# Altium PCB DC-UPS-v1.0.PcbDoc (part 1 of 8)
Units mil, origin at the board's own origin, x right, y up, seen from the top; angles counter-clockwise.
Board outline 5905.51 x 3937.01 mil, 4 copper layers (Top Layer, SIG+PWR, SIG+GND, Bottom Layer), stack 62.449 mil thick; 278 components, 138 nets, 716 pads, 780 vias.
Unrouted connection lines stored in the file: 13.
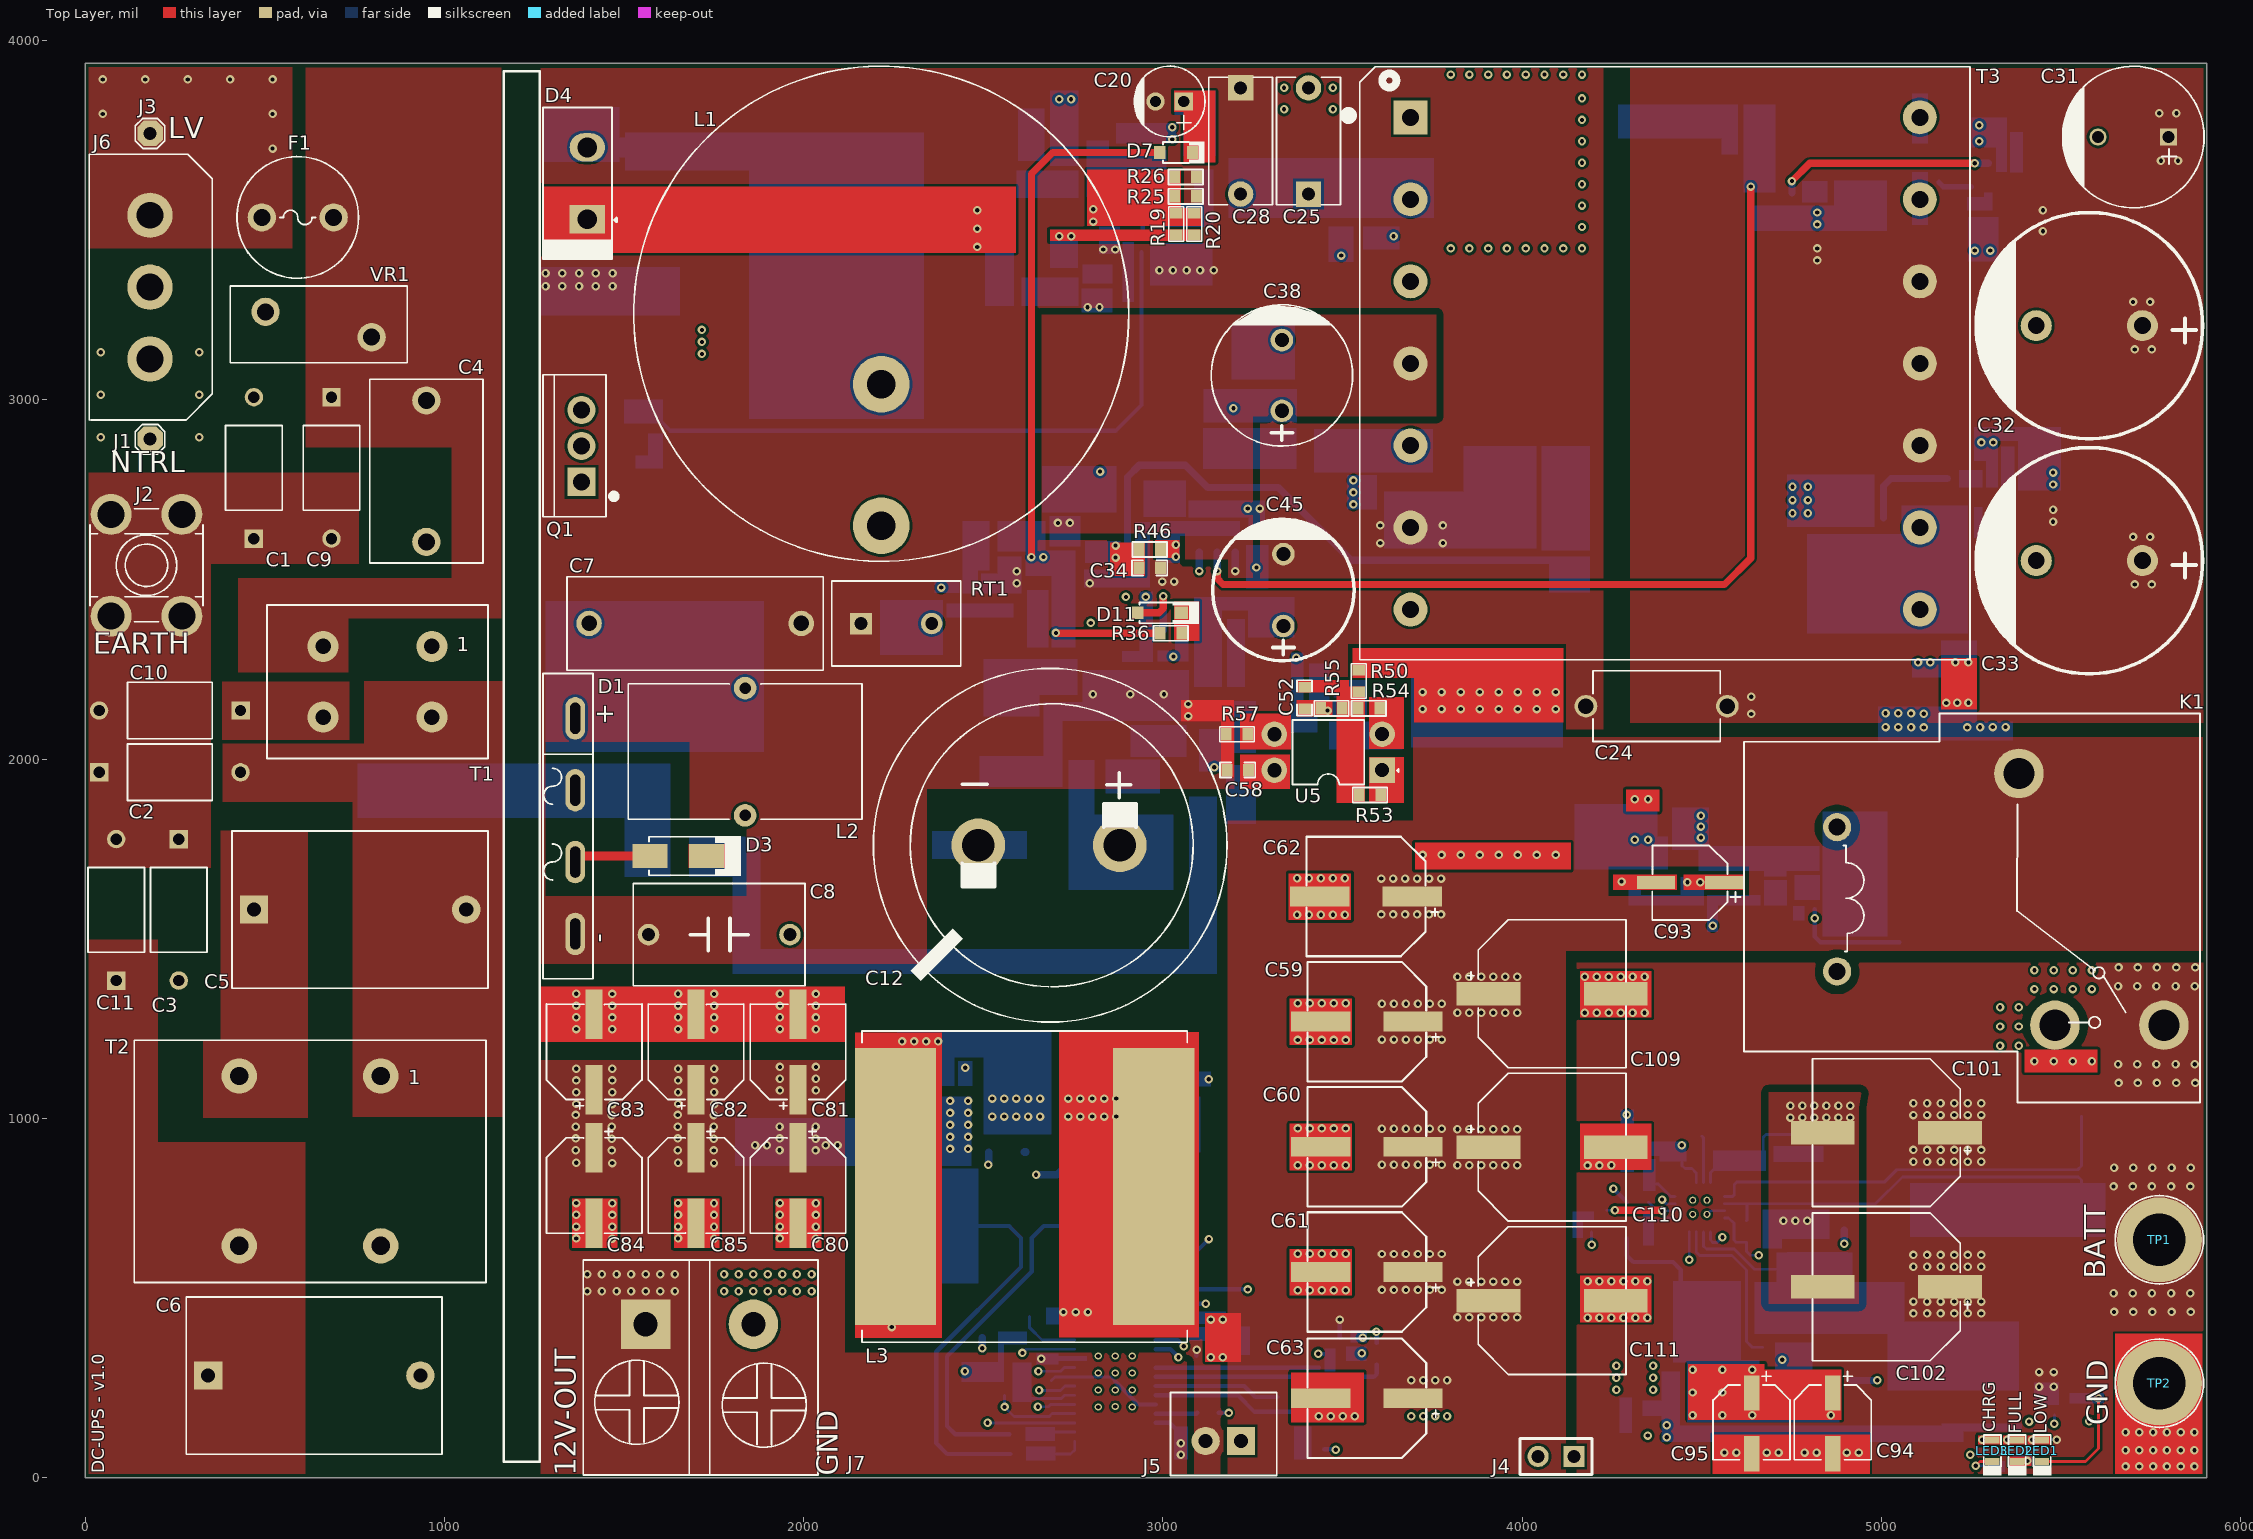
[diagram p0: Top Layer view]
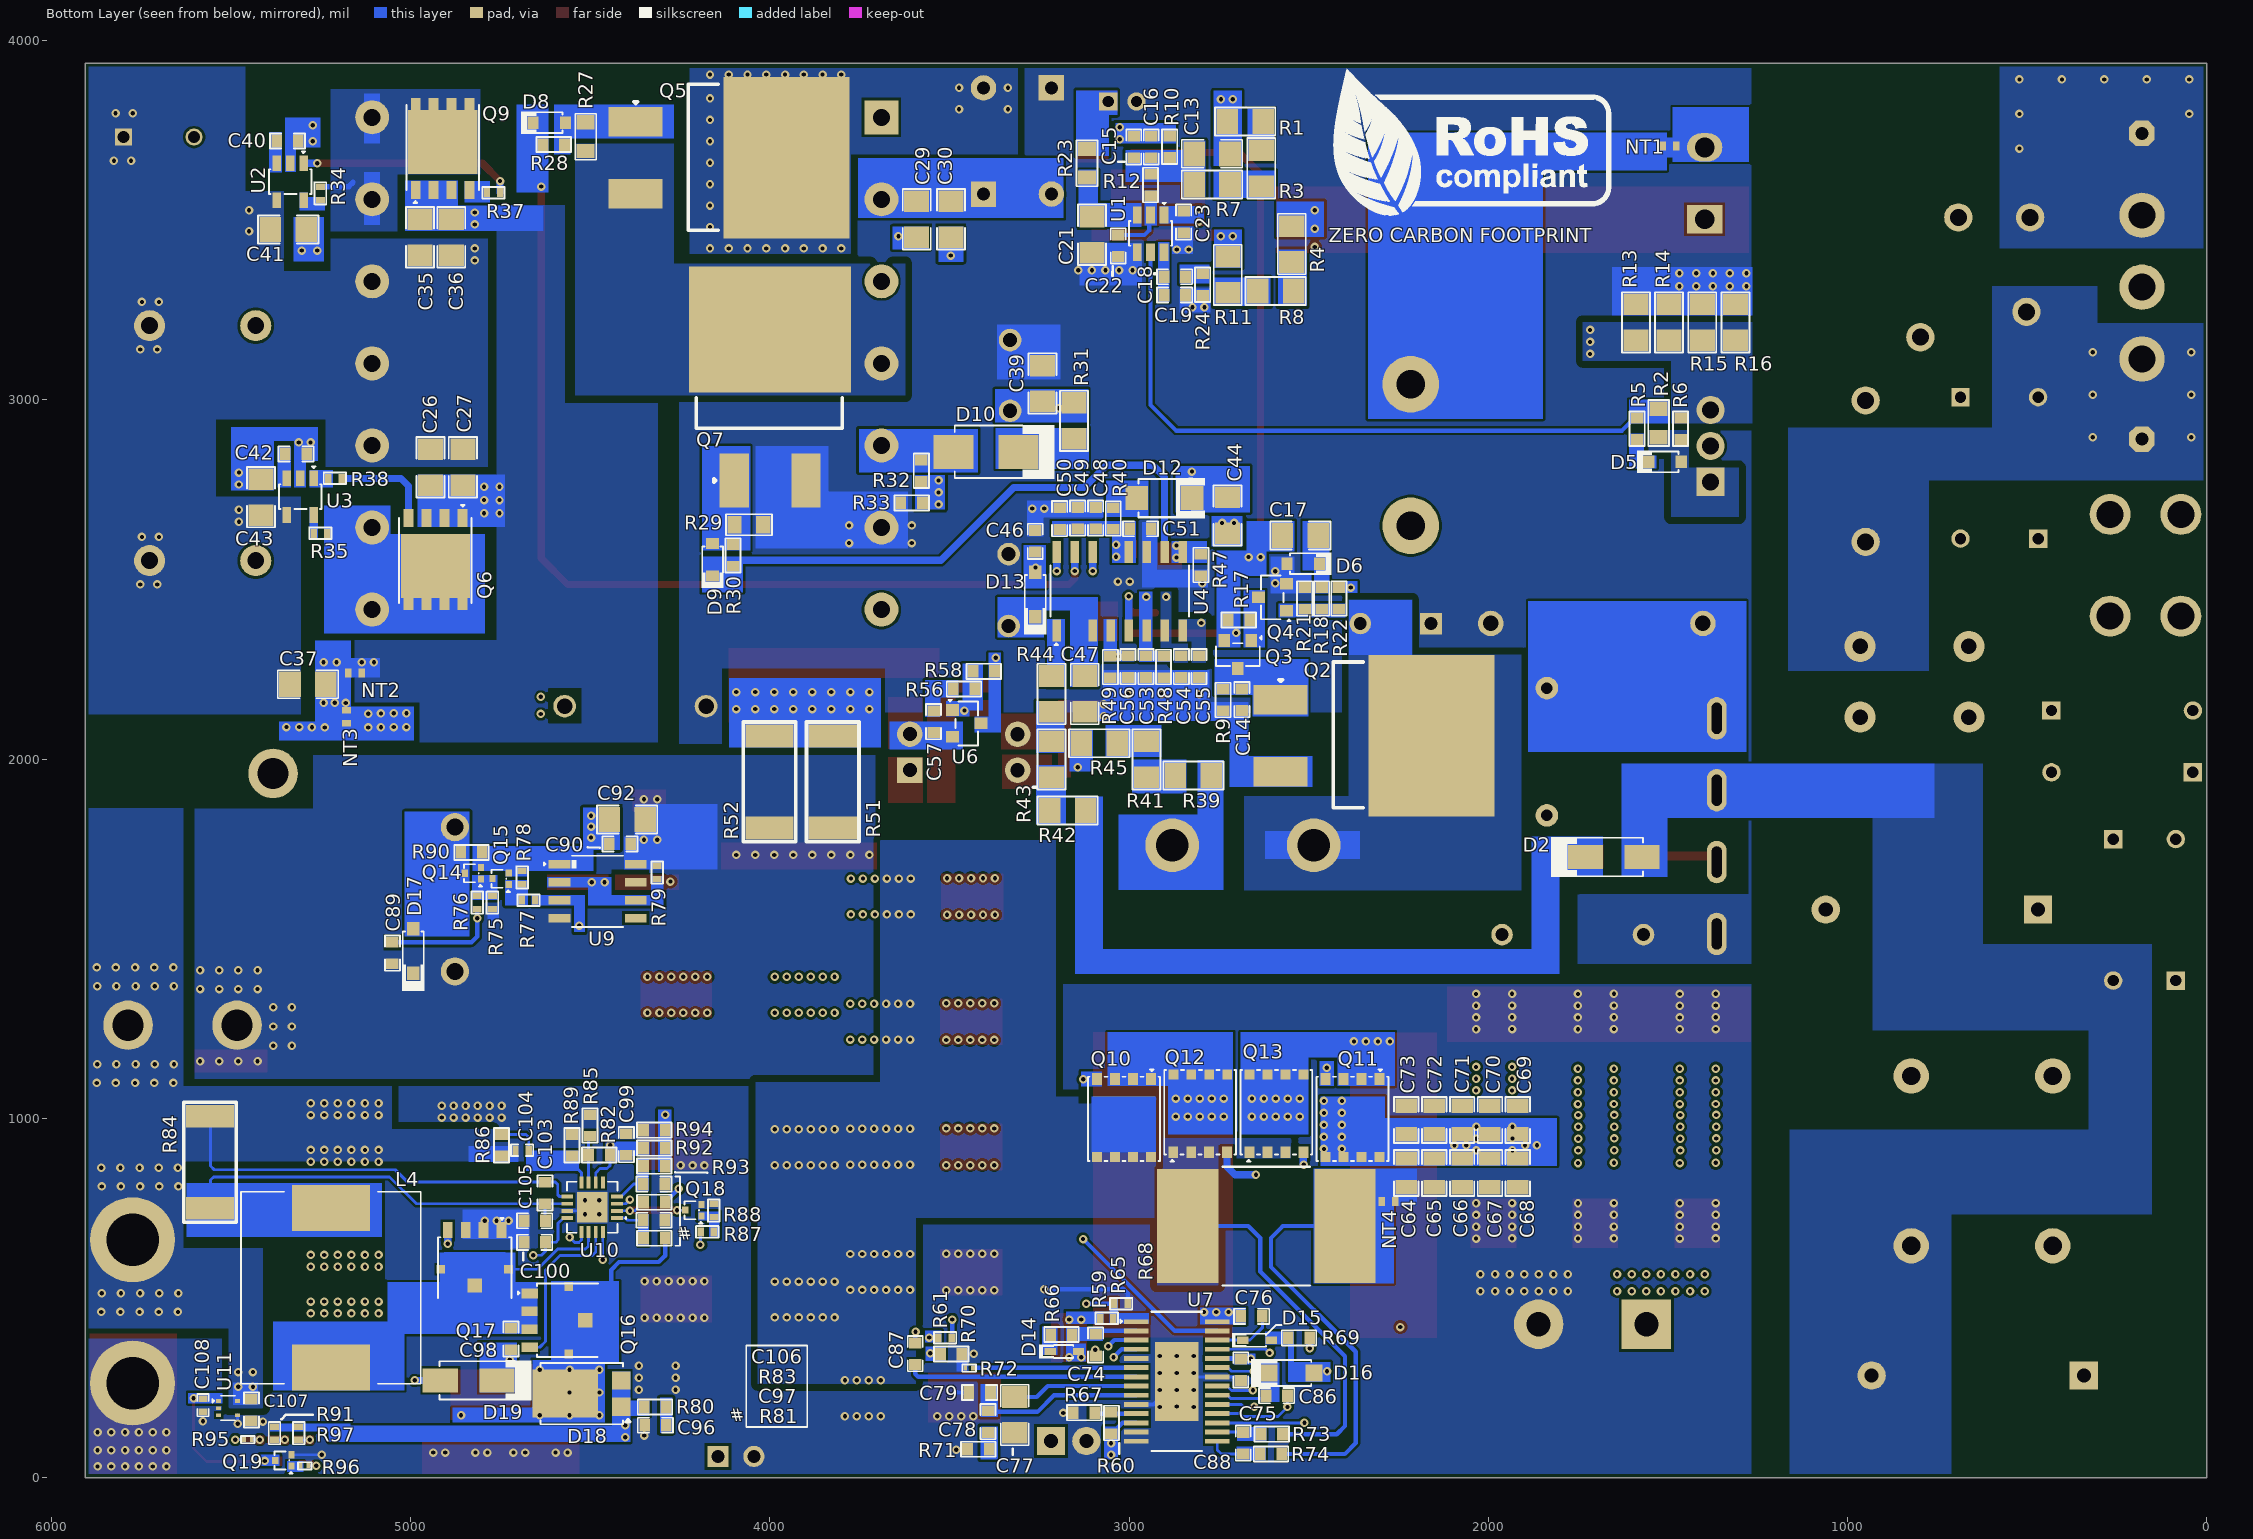
[diagram p1: Bottom Layer view, seen from below]
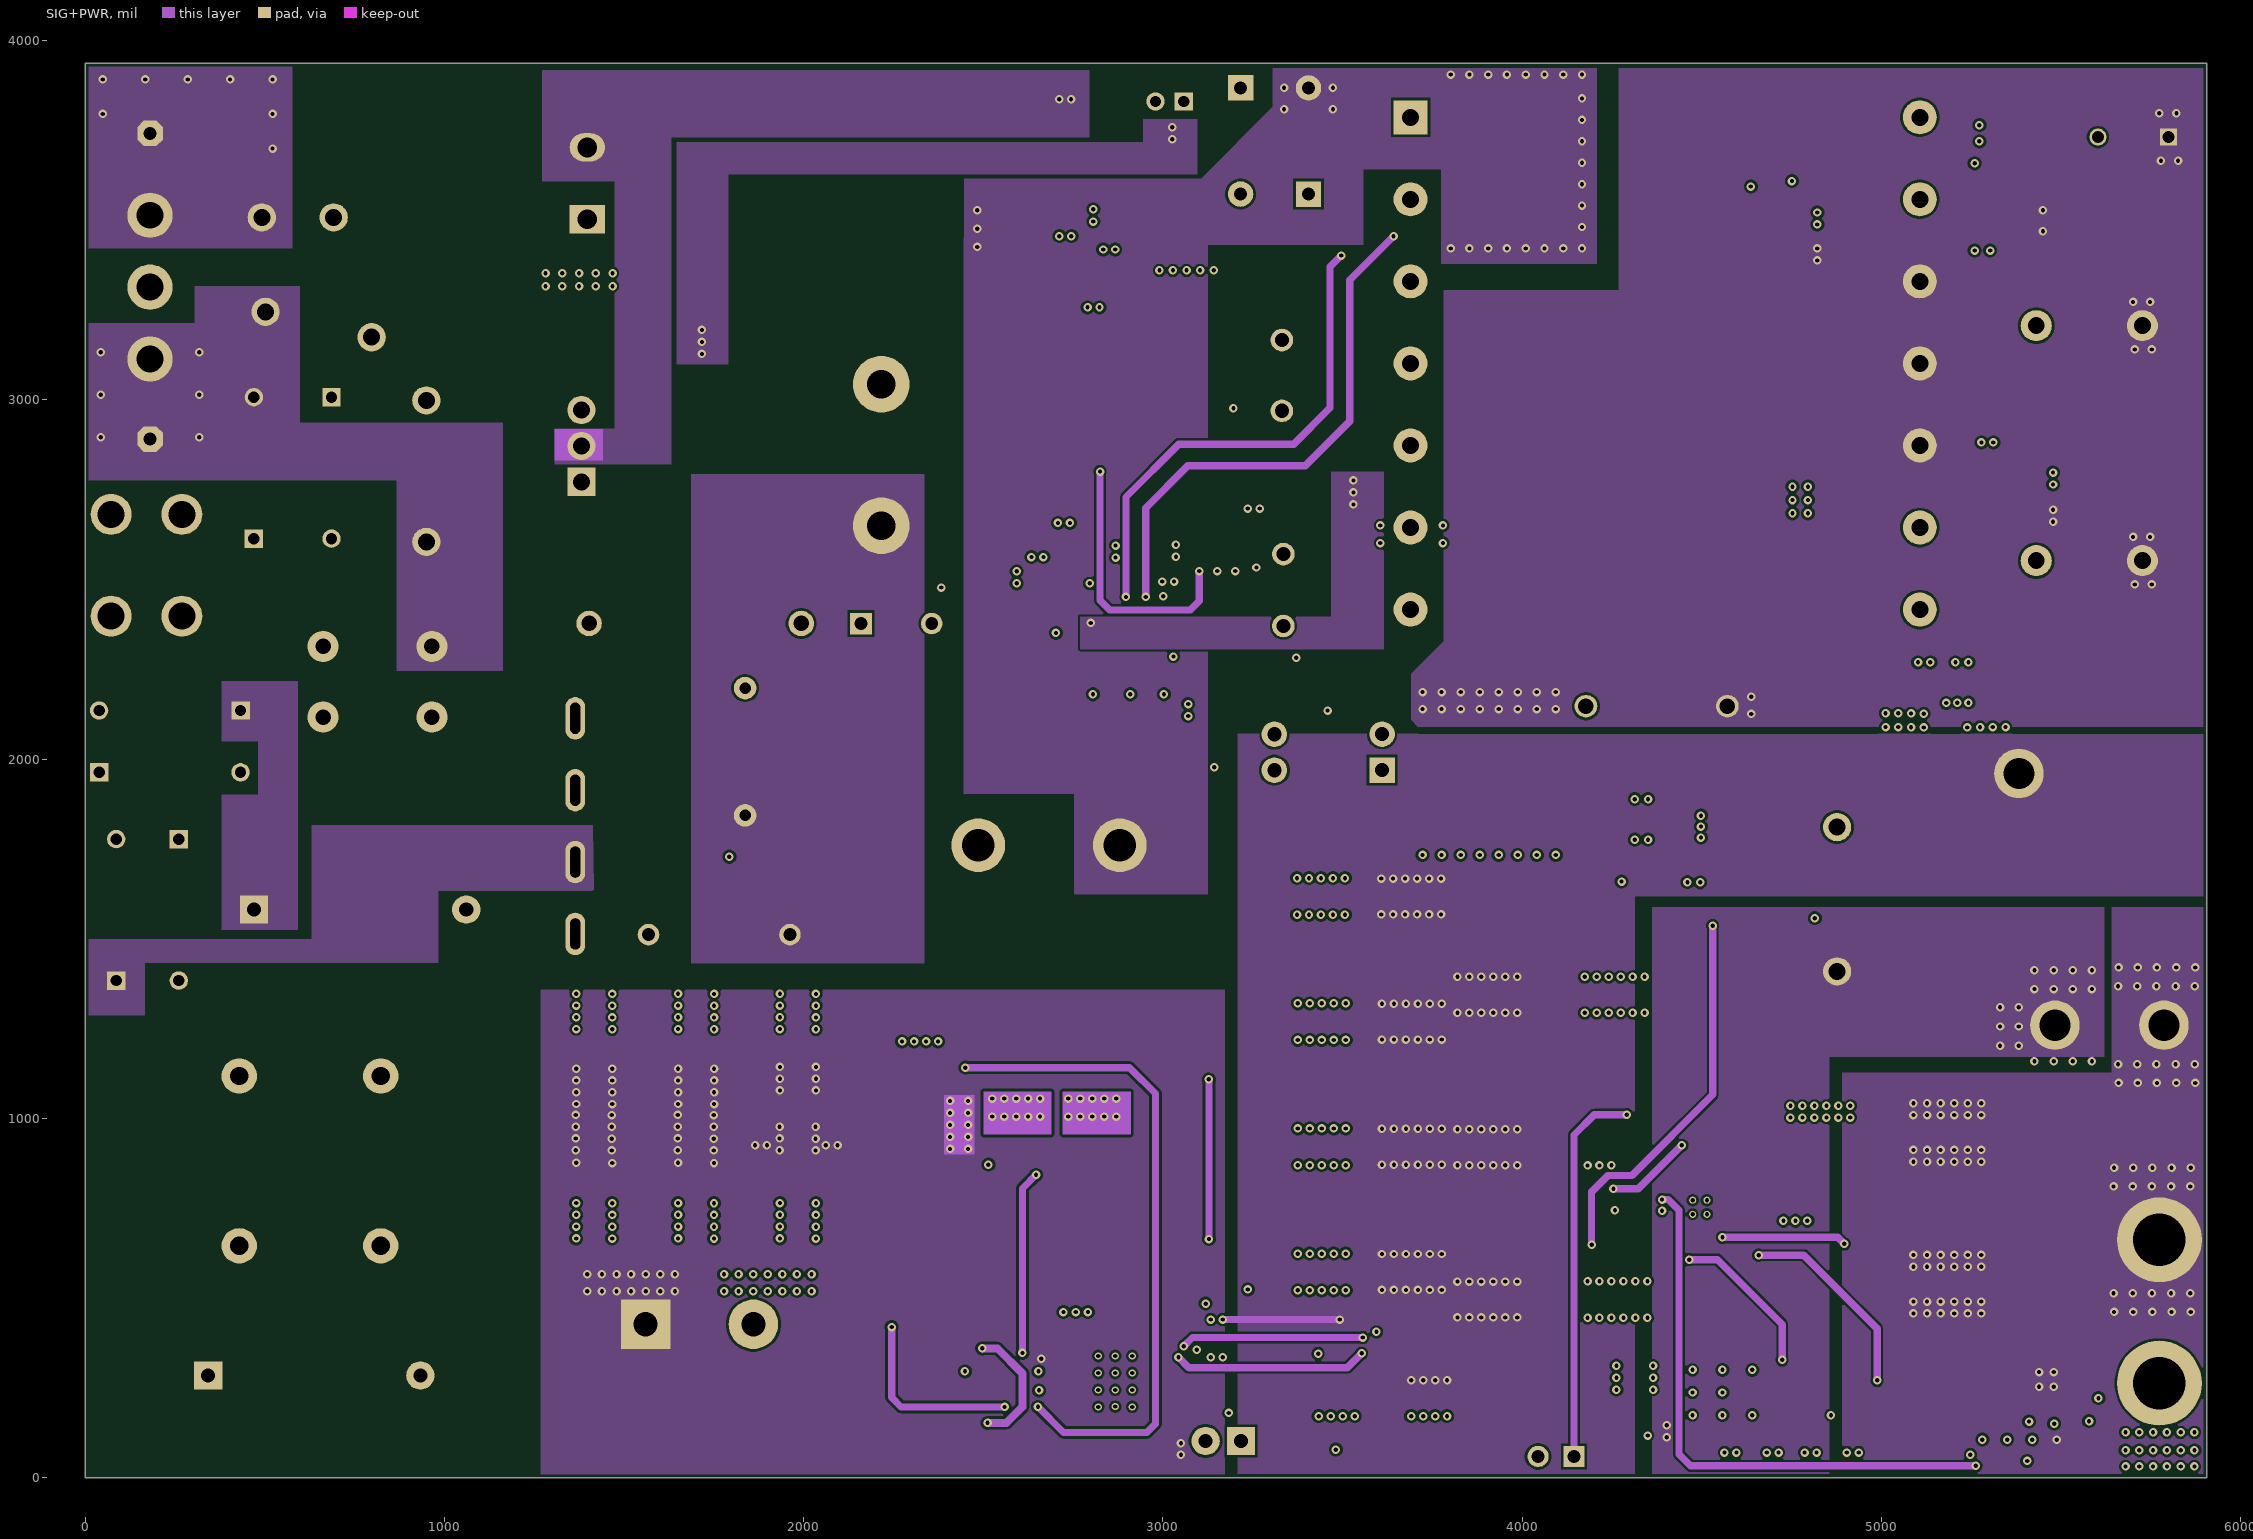
[diagram p2: SIG+PWR]
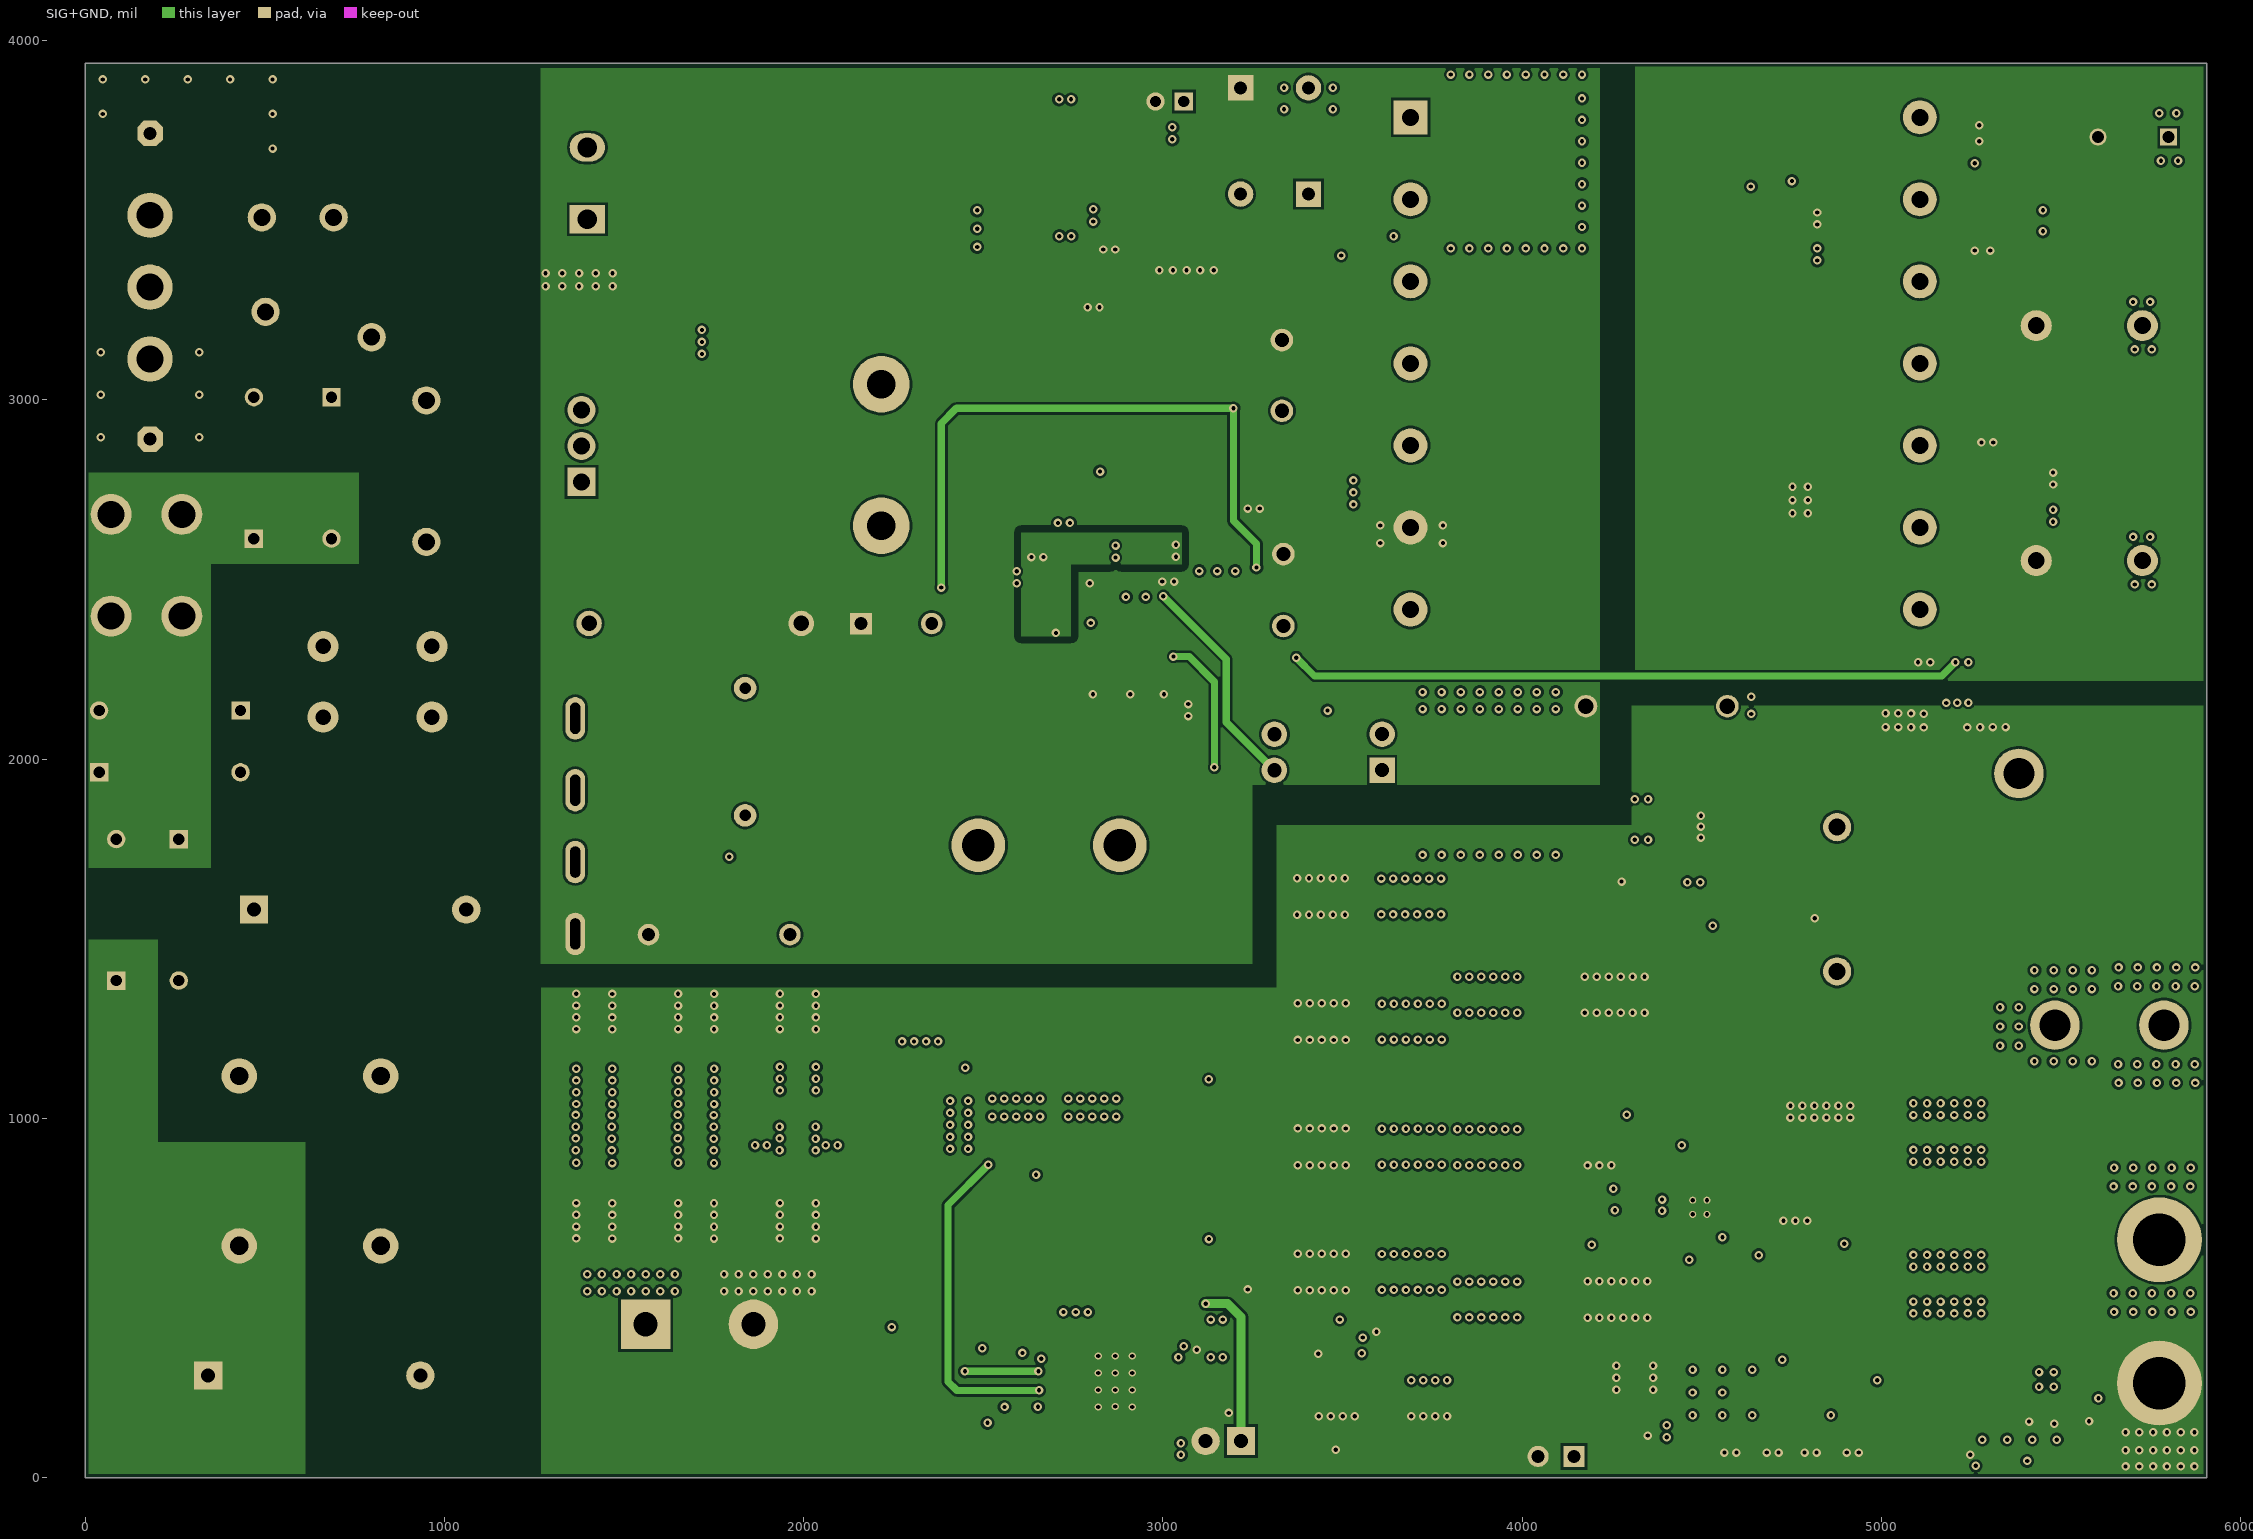
[diagram p3: SIG+GND]
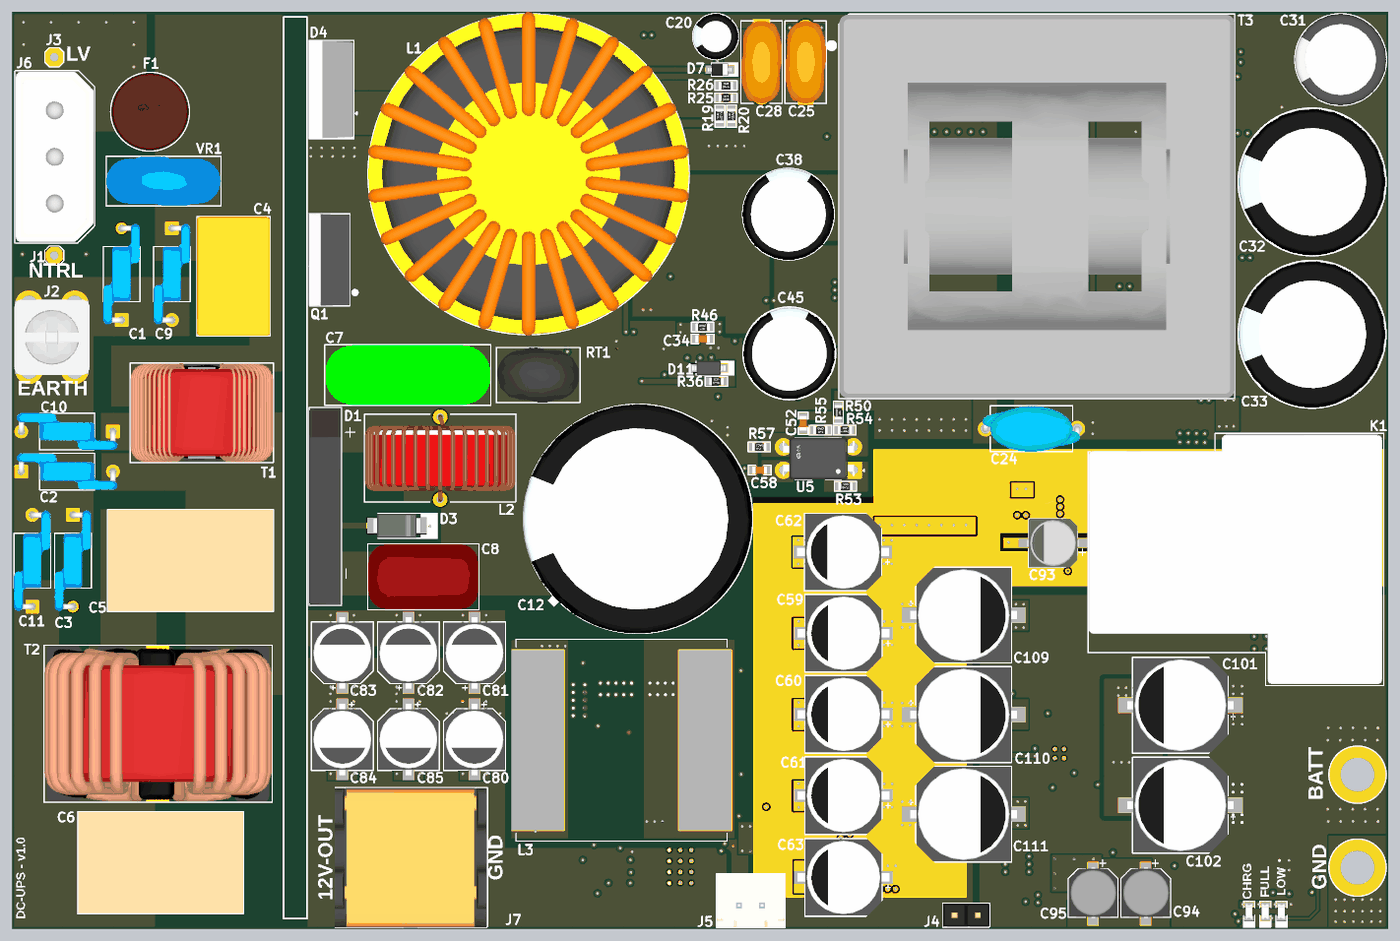
[diagram p6: 3D render of the assembled board from above, using the file's embedded part models]
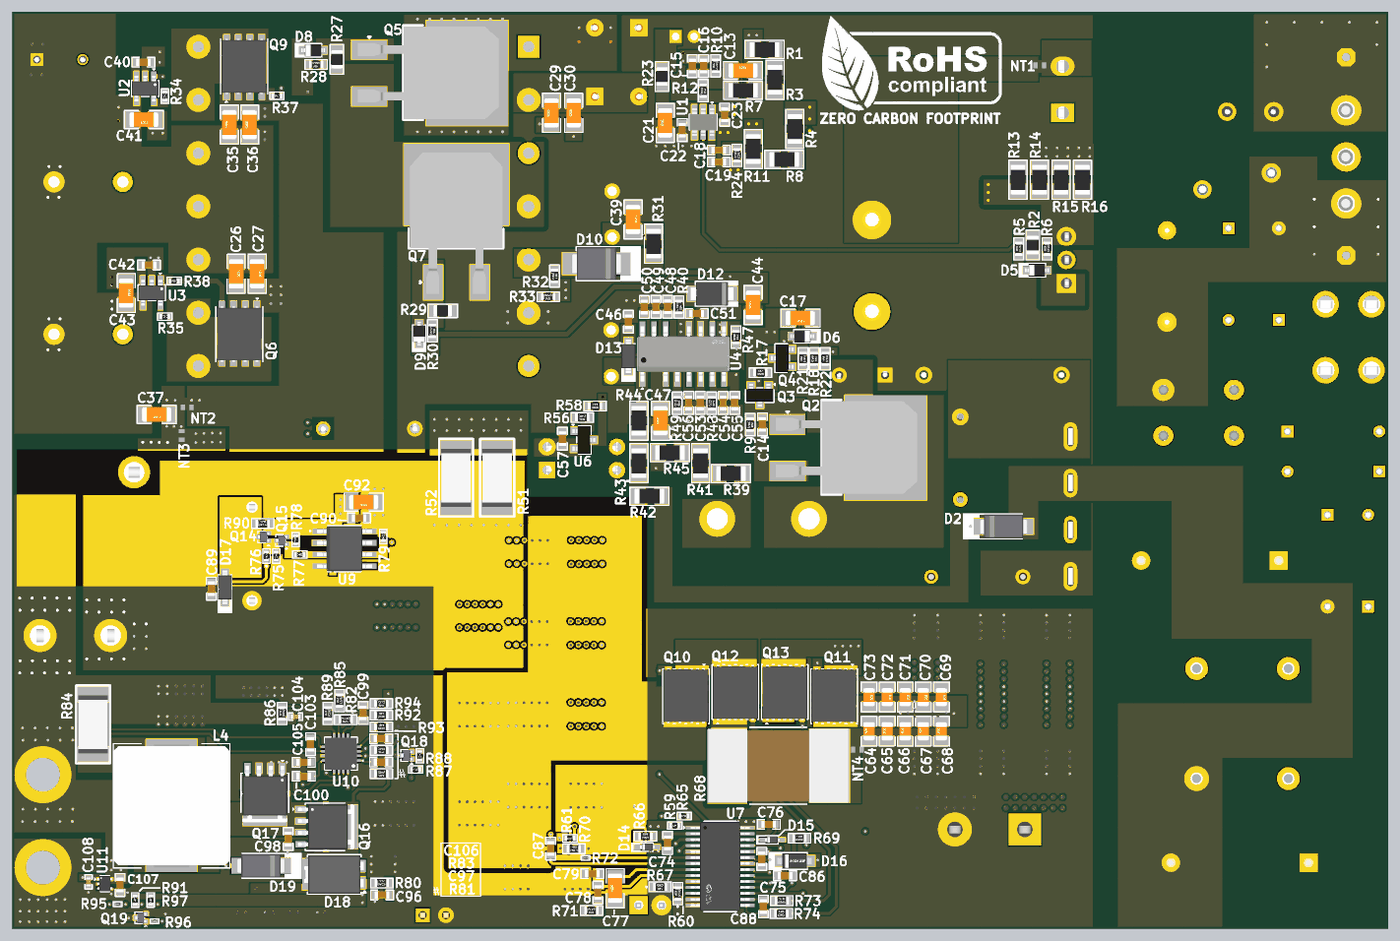
[diagram p7: 3D render of the assembled board from below, using the file's embedded part models]

## Layer stack, top to bottom
Top Solder: solder mask 0.4, Solder Resist, Dk 3.5
Top Layer: signal copper 1.378
Dielectric 2: prepreg 8.284, PP-006, Dk 4.1
SIG+PWR: signal copper 0.598
Dielectric 1: core 41.929, FR-4, Dk 4.8
SIG+GND: signal copper 0.598
Dielectric 3: prepreg 8.284, PP-006, Dk 4.1
Bottom Layer: signal copper 1.378
Bottom Solder: solder mask 0.4, Solder Resist, Dk 3.5

## Board outline
0,0 0,3937.01 5905.51,3937.01 5905.51,0

## Design rules (kind name [scope] priority, off if disabled: settings)
BoardOutlineClearance [All] p1: gap=0 ignorepadtopadclearanceinfootprint=FALSE except(10: Poly-OutlineEdge)
Clearance "DC PWR" [All vs InNet('12V') OR InNet('GND') OR InNet('12V#') OR InNet('SGND') OR InNet('12V-OUT') OR InNet('DC-GND') OR InNet('BUCK-BOOST-IN')] p1: gap=7 ignorepadtopadclearanceinfootprint=FALSE except(0: Arc-Hole Track-Hole SMDPad-Hole THPad-Hole Via-Hole Fill-Hole Poly-Hole Region-Hole Text-Hole; 4: Arc-SMDPad Track-SMDPad SMDPad-SMDPad; 20: Poly-Poly)
Clearance [All] p2: gap=7 ignorepadtopadclearanceinfootprint=FALSE except(0: Arc-Hole Track-Hole SMDPad-Hole THPad-Hole Via-Hole Fill-Hole Poly-Hole Region-Hole Text-Hole; 4: Arc-SMDPad Track-SMDPad SMDPad-SMDPad)
Height [All] p1: minheight=0 maxheight=2000 prefheight=500
HoleSize [All] p1: absolutevalues=TRUE maxlimit=10000 minlimit=1 maxpercent=80.000 minpercent=20.000
HoleToHoleClearance [All] p1: gap=0 allowstackedmicrovias=TRUE
MinimumSolderMaskSliver [All] p1: minsoldermaskwidth=0
PolygonConnect [All] p1: connectstyle=Direct reliefconductorwidth=30 reliefentries=4 polygonreliefangle="90 Angle" airgapwidth=10
RoutingVias [All] p1: holewidth=11.81 width=23.62 viastyle="Through Hole" minholewidth=11.81 minwidth=23.62 maxholewidth=11.81 maxwidth=23.62
SilkToSilkClearance [All] p1: silktosilkclearance=0
SilkToSolderMaskClearance [IsPad] p1: minsilkscreentomaskgap=0 clearancetoexposedcopper=TRUE
SolderMaskExpansion [All] p1: expansion=4 istentingtop=FALSE
UnRoutedNet [All] p1: checkbadconnections=TRUE
Width [All] p1: maxlimit=100 minlimit=8 preferedwidth=8
23 further rules are at their usual default settings.

## Classes and differential pairs
component class Relay-Switch-Sheet: C89 C90 C92 C93 D17 K1 Q14 Q15 R75 R76 R77 R78 R79 R90 U9
component class Power-Sheet-3: C34 C44 C45 C46 C47 C48 C49 C50 C51 C52 C53 C54 C55 C56 C57 C58 D11 D12 D13 R36 R39 R40 R41 R42 R43 R44 R45 R46 R47 R48 R49 R50 R51 R52 R53 R54 R55 R56 R57 R58 U4 U5 U6
component class Power-Sheet-2: C24 C25 C26 C27 C28 C29 C30 C31 C32 C33 C35 C36 C37 C38 C39 C40 C41 C42 C43 D8 D9 D10 NT2 NT3 Q5 Q6 Q7 Q9 R27 R28 R29 R30 R31 R32 R33 R34 R35 R37 R38 T3 U2 U3
component class Power-Sheet-1: C1 C2 C3 C4 C5 C6 C7 C8 C9 C10 C11 C12 C13 C14 C15 C16 C17 C18 C19 C20 C21 C22 C23 D1 D2 D3 D4 D5 D6 D7 F1 J1 J2 J3 J6 L1 L2 NT1 Q1 Q2 Q3 Q4 R1 R2 R3 R4 R5 R6 R7 R8 R9 R10 R11 R12 R13 R14 R15 R16 R17 R18 R19 R20 R21 R22 R23 R24 R25 R26 RT1 T1 T2 U1 VR1
component class Charging-Sheet: C94 C95 C96 C97 C98 C99 C100 C101 C102 C103 C104 C105 C106 C107 C108 D18 D19 J4 L4 LED1 LED2 LED3 Q16 Q17 Q18 Q19 R80 R81 R82 R83 R84 R85 R86 R87 R88 R89 R91 R92 R93 R94 R95 R96 R97 TP1 TP2 U10 U11
component class Buck-Boost-Sheet: C59 C60 C61 C62 C63 C64 C65 C66 C67 C68 C69 C70 C71 C72 C73 C74 C75 C76 C77 C78 C79 C80 C81 C82 C83 C84 C85 C86 C87 C88 C109 C110 C111 D14 D15 D16 J5 J7 L3 NT4 Q10 Q11 Q12 Q13 R59 R60 R61 R65 R66 R67 R68 R69 R70 R71 R72 R73 R74 U7

## Components (designator, comment, footprint, x,y, rotation, side; value= is the part's Value field where it differs from the comment)
C1 "100pF" DE1B3RA101KN4AN01F 470,2810.25 r90 top locked
C2 "220pF" DE1B3RA221KN4AN01F 236.03,1963.01 r0 top locked
C3 "220pF" DE1B3RA221KN4AN01F 261,1580.22 r270 top locked
C4 "220nF" X2P2224KN1B0130150080ES0 950,2801.1 r270 top locked
C5 "0.47UF" R46KI347050M1K 765.76,1581 r0 top locked
C6 "0.47UF" R46KI347050M1K 638,284.25 r0 top locked
C7 "470nF" 450MPK474J 1698,2377.25 r180 top locked
C8 "1uF" MPP105J2W10KN22605 1765,1511.25 r0 top locked
C9 "100pF" DE1B3RA101KN4AN01F 686,2810.25 r270 top locked
C10 "220pF" DE1B3RA221KN4AN01F 236.03,2135.01 r180 top
C11 "220pF" DE1B3RA221KN4AN01F 86.76,1580.22 r90 top locked
C12 "150uF" KN151M45025*30A 2683,1760 r180 top locked
C13 "10pF" Cap-1206 2769,3684.25 r180 bottom locked
C14 "100nF" Cap-0603 2686,2165.25 r90 bottom locked
C15 "3.9nF" Cap-0603 2987,3703.25 r270 bottom locked
C16 "560pF" Cap-0603 2938,3703.25 r270 bottom locked
C17 "470nF" Cap-1206 2523,2621.75 r0 bottom locked
C18 "0.22uF" Cap-0603 2873,3342.25 r0 bottom locked
C19 "0.1uF" Cap-0603 2873,3291.25 r0 bottom locked
C20 "10uF" ERM1HM100D11OT 3018.63,3830 r180 top locked
C21 "0.47uF" Cap-1206 3103,3459.25 r90 bottom locked
C22 "10pF" Cap-0603 3030,3428.25 r90 bottom locked
C23 "1000pF" Cap-0603 2848,3494.25 r90 bottom locked
C24 "2.2nF" DE1E3RA222MA4BN01F 4374,2147 r0 top locked
C25 "22nF" KP223J2J0701 3405,3720 r90 top locked
C26 "4.7uF" Cap-1206 4944,2812 r270 bottom locked
C27 "4.7uF" Cap-1206 4854,2812 r270 bottom locked
C28 "22nF" KP223J2J0701 3216,3720 r270 top locked
C29 "150pF" Cap-1206 3591,3502.25 r90 bottom locked
C30 "100pF" Cap-1206 3495.76,3502.25 r90 bottom
C31 "680uF" EEU-FR1V681B 5700.57,3731 r180 top locked
C32 "2200uF" ERF1VM222L25OT 5578,3206 r180 top locked
C33 "2200uF" ERF1VM222L25OT 5578,2552 r180 top locked
C34 "47nF" Cap-0603 2963,2532 r180 top locked
C35 "4.7uF" Cap-1206 4973.25,3452 r90 bottom locked
C36 "4.7uF" Cap-1206 4886.13,3452 r90 bottom locked
C37 "0.1uF" Cap-1206 5285,2208 r0 bottom locked value=100nF
C38 "470uF" EEUFR1V471B 3331,3067.58 r90 top locked
C39 "2.2uF" Cap-1206 3241,3045 r270 bottom locked
C40 "2.2uF" Cap-0603 5342,3720 r0 bottom locked
C41 "0.1uF" Cap-1206 5339.71,3473.36 r0 bottom locked value=100nF
C42 "2.2uF" Cap-0603 5318,2849.25 r0 bottom locked
C43 "0.1uF" Cap-1206 5416,2729 r270 bottom locked value=100nF
C44 "2.2uF" Cap-1206 2726,2678 r90 bottom locked
C45 "1000uF" ERR1VM102G20OT 3335,2470.25 r90 top locked
C46 "2.2uF" Cap-0603 3261,2606 r90 bottom locked
C47 "1uF" Cap-1206 3123,2181 r90 bottom locked
C48 "4.7uF" Cap-0603 3093,2670.18 r270 bottom locked
C49 "4.7uF" Cap-0603 3143,2670.18 r270 bottom locked
C50 "4.7uF" Cap-0603 3193,2669 r270 bottom locked
C51 "10nF" Cap-0603 2968,2641 r0 bottom locked
C52 "100pF" Cap-0603 3394,2170 r90 top locked
C53 "220pF" Cap-0603 2953.2,2257.25 r90 bottom locked
C54 "10nF" Cap-0603 2854.4,2257.25 r90 bottom locked
C55 "47pF" Cap-0603 2805,2257.25 r90 bottom locked
C56 "4.7nF" Cap-0603 3002.6,2257.25 r90 bottom locked
C57 "47nF" Cap-0603 3544,2104 r90 bottom locked
C58 "DNP" Cap-0603 3208,1969.2 r0 top locked
C59 "18uF" 50SVPF18M 3567.27,1269.11 r180 top locked
C60 "18uF" 50SVPF18M 3567.27,920.77 r180 top locked
C61 "18uF" 50SVPF18M 3567.27,572.44 r180 top locked
C62 "18uF" 50SVPF18M 3565.02,1617.44 r180 top locked
C63 "18uF" 50SVPF18M 3567.27,221 r180 top locked
C64 "4.7uf" Cap-0805 2228.22,848.25 r90 bottom locked
C65 "4.7uf" Cap-0805 2150.67,848.25 r90 bottom locked
C66 "4.7uf" Cap-0805 2073.11,848.25 r90 bottom locked
C67 "4.7uf" Cap-0805 1995.56,848.25 r90 bottom locked
C68 "4.7uf" Cap-0805 1918,848.25 r90 bottom locked
C69 "4.7uf" Cap-0805 1918,995.25 r270 bottom locked
C70 "4.7uf" Cap-0805 1995.56,995.25 r270 bottom locked
C71 "4.7uf" Cap-0805 2073.11,995.25 r270 bottom locked
C72 "4.7uf" Cap-0805 2150.67,995.25 r270 bottom locked
C73 "4.7uf" Cap-0805 2228.22,995.25 r270 bottom locked
C74 "0.1uF" CAP-0603 3093,369.25 r90 bottom locked
C75 "0.1uF" CAP-0603 2689,300.25 r90 bottom locked
C76 "0.1uF" CAP-0603 2659,449 r180 bottom locked
C77 "680nF" Cap-1206 3318,174.42 r90 bottom locked
C78 "68nF" Cap-0603 3392.22,156 r90 bottom locked
C79 "2.2nF" Cap-0603 3415.75,237 r180 bottom locked
C80 "270uF" 16SVPG270M 1984,812.88 r270 top locked
C81 "270uF" 16SVPG270M 1984.02,1185.12 r90 top locked
C82 "270uF" 16SVPG270M 1700.52,1185.12 r90 top locked
C83 "270uF" 16SVPG270M 1417.02,1185.12 r90 top locked
C84 "270uF" 16SVPG270M 1417,812.88 r270 top locked
C85 "270uF" 16SVPG270M 1700.5,812.88 r270 top locked
C86 "0.1uF" CAP-0603 2589,228.25 r0 bottom locked
C87 "330pF" Cap-0603 3594.83,345 r270 bottom locked
C88 "47pF" Cap-0603 2682,96 r270 bottom locked
C89 "0.1uF" CAP-0603 5050,1460 r270 bottom locked
C90 "0.1uF" CAP-0603 4416.7,1764 r180 bottom locked
C92 "4.7uF" Cap-1206 4396.7,1831.91 r0 bottom locked
C93 "33uF" RVT1E330M0505 4466.52,1656 r180 top
C94 "15uF" UUD1V150MCL1GS 4864,151 r270 top
C95 "15uF" UUD1V150MCL1GS 4638,151 r270 top locked
C96 "2.2uF" Cap-0603 4318,145.75 r0 bottom locked
C97 "1uF" Cap-0603 4322,716.42 r0 bottom locked
C98 "0.1uF" CAP-0603 4720.49,386 r270 bottom locked
C99 "1uF" Cap-0603 4399,927 r270 bottom locked
C100 "1uF" Cap-0603 4654,655 r180 bottom locked
C101 "68uF" 50SVPF68M 5013,960 r180 top
C102 "68uF" 50SVPF68M 5013,531 r180 top
C103 "0.1uF" CAP-0603 4625.34,792.34 r270 bottom locked
C104 "22PF" Cap-0402 4689,911 r0 bottom locked value=22pF
C105 "0.1uF" CAP-0603 4654,715 r0 bottom locked
C106 "0.1uF" CAP-0603 4322,816.75 r180 bottom locked
C107 "1uF" Cap-0603 5442.31,188.69 r90 bottom locked
C108 "100pF" Cap-0402 5577.31,201.69 r90 bottom locked
C109 "68uF" 50SVPF68M 4083,1346.77 r0 top
C110 "68uF" 50SVPF68M 4083,919.77 r0 top locked
C111 "68uF" 50SVPF68M 4083,492.77 r0 top
D1 "GBU806" GBU 1364.35,1813.25 r270 top locked
D2 "MURA160T3G" SMA 1651,1727.25 r180 bottom locked
D3 "MURA160T3G" SMA 1651,1730.25 r180 top locked
D4 "STTH8L06FP" TO-220-2 1398,3602.25 r90 top locked
D5 "MMDL914-TP" SOD-323 1508,2827 r180 bottom locked
D6 "MMDL914-TP" SOD-323 2515,2543.75 r0 bottom locked
D7 "1N4148WS-7-F" SOD-323 3036.72,3688 r180 top locked
D8 "MMDL914-TP" SOD-323 4613.69,3771 r180 bottom locked
D9 "MMDL914-TP" SOD-323 4159,2554.72 r90 bottom locked
D10 "STPS160UY" SMB_ 3398,2855 r180 bottom locked
D11 "MMSZ5234B-7-F" SOD-123 2988.99,2407 r0 top locked
D12 "ES1JF" DO-214AD 2901.84,2726 r0 bottom locked
D13 "1N4148W-7-F" SOD-123 3261,2458 r270 bottom locked value=2pF
D14 "CDBUR0230L-HF" SOD-523F 3180,351.25 r0 bottom locked
D15 "CDBUR0230L-HF" SOD-523F 2643.99,382.25 r0 bottom locked
D16 "B0520W" SOD-123F 2548.01,291.25 r0 bottom locked
D17 "1N4148W-7-F" SOD-123 4992,1466 r270 bottom locked value=2pF
D18 "ST2045" TO-277 4491.24,233.75 r90 bottom locked
D19 "SS24A" SMA 4837.74,270.79 r0 bottom locked
F1 "37215000001" 37215000001 592,3507.25 r0 top locked
J1 "Test Point -TH 1.8mm Hole size 0.92mm" "Test Point -TH 1.8mm Hole size 0.92mm" 181,2890.25 r180 top locked
J2 "T44001" T44001 171,2539.25 r180 top locked
J3 "Test Point -TH 1.8mm Hole size 0.92mm" "Test Point -TH 1.8mm Hole size 0.92mm" 181,3741.25 r180 top locked
J4 "X6511WV-02H-C60D30" HDR1X2_ 4144,59 r180 top locked
J5 "B2B-XH-A(LF)(SN)" B2B-XH-A(LF)(SN)_ 3168,102 r180 top locked
J6 "X5050WV-03-N2SN" X5050WV-03-N2SN 181,3513.25 r270 top locked
J7 "DBT50G-7.62-2P-BK-P" DBT50G-7.62-2P-BK-P 1710,427 r0 top locked
K1 "NB90-12S-S-C" NB90-12S-S-C 5330.81,1609.61 r270 top locked
L1 "85uH" FC-PFC1060-850M-B-L 2216,2846.15 r270 top locked
L2 "100uH" 7447021 1837,2020.25 r0 top locked
L3 "1uH" FXL2213-1R0-M 2615,810 r180 top locked
L4 "1.5uH" FAUL1350-1R5MT 5221,528.54 r90 bottom locked
LED1 "RED" LED-0603 5446.64,74.75 r270 top locked
LED2 "Emerald" LED-0603 5377.32,74.75 r270 top locked
LED3 "NCD0603O2" LED-0603 5308,74.75 r270 top locked
NT1 "Net Tie_SMD" "Net Tie Pad"#1 1496,3706 r180 bottom locked net-tie
NT2 "Net Tie_SMD" "Net Tie Pad"#1 5154.5,2239 r0 bottom net-tie
NT3 "Net Tie_SMD" "Net Tie Pad"#2 5178,2117.5 r90 bottom locked net-tie
NT4 "Net Tie_SMD" "Net Tie Pad"#1 2278,769 r180 bottom locked net-tie
Q1 "IPP60R099P7XKSA1" TO-220-3 1381.57,2871.25 r90 top locked
Q2 "STB24NM60N-VB" TO-263 2367.96,2065 r270 bottom locked
Q3 "SI2309CDS-T1-E3" SOT-23 2697.25,2291 r0 bottom locked
Q4 "MMBT4401-7-F" SOT-23 2600.88,2450 r90 bottom locked
Q5 "SIHB24N80AE-GE3" TO-263 4163,3673 r270 bottom locked
Q6 "CSD19502Q5B" VSON-CLIP-8(6x5) 4930.1,2552.73 r270 bottom locked
Q7 "SIHB24N80AE-GE3" TO-263 3999,2985.04 r180 bottom locked
Q9 "CSD19502Q5B" VSON-CLIP-8(6x5) 4910.1,3701.73 r90 bottom locked
Q10 "CSD18511Q5A" "8-VSONP (5x6)" 3014,1001.11 r270 bottom locked
Q11 "CSD19533Q5A" "8-VSONP (5x6)" 2378,1001.11 r270 bottom locked
Q12 "CSD18531Q5A" "8-VSONP (5x6)" 2801.81,1014.28 r90 bottom locked
Q13 "CSD19533Q5A" "8-VSONP (5x6)" 2589.81,1014.28 r90 bottom locked
Q14 "MMBT3904M" SOT-723 4826,1682 r90 bottom locked
Q15 "MMBT3904M" SOT-723 4749,1666.91 r90 bottom locked
Q16 "SIR426DP-T1-GE3" PowerPAK-SO-8 4590.73,438 r180 bottom locked
Q17 "SIR426DP-T1-GE3" PowerPAK-SO-8 4821,612 r270 bottom locked
Q18 "MMBT3904M" SOT-723 4212.36,744.33 r90 bottom locked
Q19 "MMBT3904M" SOT-723 5353.36,48 r90 bottom locked
R1 "3.09MR" Res-1206 2677,3774.25 r0 bottom locked
R2 "10R" RES-0805 1526,2935 r270 bottom locked
R3 "3.3MR" Res-1206 2632,3644.25 r90 bottom locked
R4 "3.09MR" Res-1206 2547,3433.25 r90 bottom locked
R5 "1R" Res-0603 1586,2919 r270 bottom locked
R6 "82.5K" Res-0603 1465,2919 r270 bottom locked
R7 "3.3MR" Res-1206 2769,3599.25 r180 bottom locked
R8 "3.3MR" Res-1206 2592,3302.25 r180 bottom locked
R9 "1M" Res-0603 2738,2164.25 r90 bottom locked
R10 "24.3K" Res-0603 2887,3704.25 r270 bottom locked
R11 "3.3MR" Res-1206 2725,3347.25 r270 bottom locked
R12 "3K" Res-0603 2940,3597.25 r90 bottom locked value=3kR
R13 "0.1R" Res-1206 1589.33,3215.25 r270 bottom locked value=100mR
R14 "0.1R" Res-1206 1497,3215.25 r270 bottom locked value=100mR
R15 "0.1R" Res-1206 1404.67,3215.25 r270 bottom locked value=100mR
R16 "0.1R" Res-1206 1312.33,3215.25 r270 bottom locked value=100mR
R17 "100K" Res-0603 2694.25,2387 r0 bottom locked value=100kR
R18 "75K" Res-0603 2464,2447 r90 bottom locked value=75kR
R19 "36.5K" Res-0603 3037,3488.75 r270 top locked
R20 "120K" RES-0603 3087,3488.75 r270 top locked
R21 "49K9" Res-0603 2511.25,2447 r270 bottom locked
R22 "390K" Res-0603 2416,2447 r270 bottom locked value=390kR
R23 "10R" RES-0805 3117,3658.25 r90 bottom locked
R24 "274K" Res-0603 2795,3320.25 r90 bottom locked
R25 "75K" Res-0603 3063,3566 r180 top locked value=75kR
R26 "390K" Res-0603 3063,3620 r180 top locked value=390kR
R27 "10K" RES-0805 4512,3732 r90 bottom locked
R28 "10R" Res-0603 4601,3710 r180 bottom locked
R29 "10K" RES-0805 4058,2652 r0 bottom locked
R30 "10R" Res-0603 4102,2566.69 r90 bottom locked
R31 "0R" Res-1206 3153,2941 r270 bottom locked value=0mR
R32 "36.5K" Res-0603 3578,2802 r90 bottom locked value=36.5kR
R33 "8.45K" Res-0603 3605,2713 r180 bottom locked value=8.45kR
R34 "0R" Res-0402 5250,3574.14 r270 bottom locked
R35 "0R" Res-0402 5250.34,2628 r0 bottom locked
R36 "10K" Res-0603 3021.98,2350 r180 top locked
R37 "0R" Res-0402 4769,3576 r180 bottom locked
R38 "0R" Res-0402 5210,2781 r0 bottom locked
R39 "4.99MR" Res-1206 2821,1954 r180 bottom locked
R40 "2.2R" Res-0603 3044,2669.18 r90 bottom locked
R41 "4.99MR" Res-1206 2951,1999 r270 bottom locked
R42 "1.65K" Res-1206 3171,1857 r0 bottom locked
R43 "1.65K" Res-1206 3216,1999 r90 bottom locked
R44 "1.65K" Res-1206 3216,2181 r90 bottom locked
R45 "4.99MR" Res-1206 3083,2044 r180 bottom locked
R46 "806K" Res-0603 2963,2583 r0 top locked
R47 "150K" res-0603 2800,2540 r90 bottom locked value=150kR
R48 "100R" Res-0603 2903.8,2256.25 r90 bottom locked
R49 "44.2K" Res-0603 3052,2256.25 r90 bottom locked
R50 "20R" Res-0603 3545,2217 r90 top locked
R51 "0R" RES-2512 3824.5,1936 r270 bottom locked
R52 "0R" RES-2512 4000.5,1936 r270 bottom locked
R53 "1.5K" Res-0603 3576,1900 r180 top locked
R54 "6.04K" Res-0603 3573,2141 r180 top locked value=6.04kR
R55 "150K" Res-0603 3469,2141 r0 top locked value=150kR
R56 "25.5K" Res-0603 3459,2195 r180 bottom locked
R57 "0R" Res-0603 3206,2069 r0 top locked
R58 "17.4K" Res-0603 3404,2244 r0 bottom locked
R59 "249K" Res-0402 3062,443.25 r0 bottom locked
R60 "280K" Res-0603 3049,152 r270 bottom locked value=280kR
R61 "2K" Res-0402 3511.83,389 r180 bottom locked value=2kR
R65 "287K" Res-0402 3022,484.25 r0 bottom locked
R66 "10R" Res-0603 3188,398.25 r0 bottom locked
R67 "20K" Res-0603 3125,181 r180 bottom locked
R68 "1.5mR" 5931 2618,700.25 r0 bottom locked
R69 "10K" Res-0603 2527,389 r0 bottom locked
R70 "93.1K" Res-0603 3494.83,344 r0 bottom locked
R71 "5.36K" Res-0603 3419.22,79 r180 bottom locked
R72 "28.7K" Res-0201 3445,305 r180 bottom locked
R73 "100R" Res-0603 2603,121 r0 bottom locked
R74 "100R" Res-0603 2605,66 r0 bottom locked
R75 "10K" Res-0402 4771.7,1600.5 r270 bottom locked
R76 "100K" Res-0402 4814,1600.5 r90 bottom locked
R77 "10K" Res-0402 4671,1607 r180 bottom locked
R78 "100K" Res-0402 4689,1670.41 r270 bottom locked
R79 "56K" Res-0402 4313,1684 r90 bottom locked
R80 "2K" Res-0603 4319,196.75 r0 bottom locked
R81 "10R" Res-0603 4321,666.25 r180 bottom locked
R82 "100K" Res-0603 4474,898 r180 bottom locked
R83 "10K" Res-0603 4321,766.58 r180 bottom locked
R84 "10mR" RES-2512 5558,877.95 r90 bottom locked
R85 "93.1K" Res-0603 4500,980 r270 bottom locked
R86 "100K" Res-0603 4746.5,925 r270 bottom locked
R87 "10K" Res-0402 4173.86,683.83 r0 bottom locked
R88 "100K" Res-0402 4155.36,743.33 r270 bottom locked
R89 "100K" Res-0603 4550,925 r270 bottom locked
R90 "DNP" Res-0603 4830,1740 r0 bottom locked
R91 "1.5K" Res-0402 5378,123.78 r90 bottom locked
R92 "9.31K" Res-0603 4321,917.08 r0 bottom locked value=9.31kR
R93 "100R" Res-0603 4321,866.92 r0 bottom locked
R94 "430K" Res-0603 4321,967.25 r180 bottom locked value=430kR
R95 "68R" Res-0201 5452.46,106.02 r0 bottom locked
R96 "22K" Res-0201 5294.17,33 r180 bottom locked
R97 "1.5K" Res-0402 5311,123.78 r90 bottom locked
RT1 "10R" B57235S0100M000 2258,2377 r0 top locked
T1 "744822301" 744822301 814,2215 r180 top locked
T2 "744824310" 744824310 626.15,881.47 r180 top locked value=10mH
T3 "760895631" 760895631 4397.66,3100.96 r0 top locked value=500uH
TP1 "Th Hole Test Point (3.7mm Drill 6mm pad)" "Th Hole Test Point (3.7mm Drill 6mm pad)" 5773,662 r0 top locked
TP2 "Th Hole Test Point (3.7mm Drill 6mm pad)" "Th Hole Test Point (3.7mm Drill 6mm pad)" 5773,263 r0 top locked
U1 "UCC28056DBVT" SOT-23-6 2940,3462.25 r270 bottom locked
U2 "UCC24612-2DBVR" SOT-23-5 5334.6,3606.82 r270 bottom locked
U3 "UCC24612-2DBVR" SOT-23-5 5306.24,2730.25 r270 bottom locked
U4 "UCC256404DDBR" UCC256404DDBR 3026,2467.25 r90 bottom locked
U5 "VO618A-3" DIP-4 3460,2019 r180 top locked
U6 "TLVH431AQDBZR" SOT-23 3452,2099 r270 bottom locked
U7 "LM5176QPWPRQ1" HTSSOP-28-EP 2867.18,267.76 r180 bottom locked
U9 "NA555DR" "SOIC-8(0.154\", 3.90mm Width)" 4479,1631.91 r180 bottom locked
U10 "BQ24600RVAR" QFN-16-EP(3.6x3.6) 4494,752.5 r0 bottom locked
U11 "BD4830FVE-TR" 5-VSOF 5507.31,193.69 r180 bottom locked
VR1 "B72210S2271K101" B72210S2271K101 650,3209.25 r180 top locked value=195pF

## Footprints (in the part's own frame and the unit in brackets; to place one, negate y for a bottom-side part, rotate by r counter-clockwise, add the part's x,y. Pads: shape width x height; smd on the part's side, far side on the other; paste and mask are expansions set on the pad)
5-VSOF [mm]
  rect 0.35x0.25 smd: 1(-0.675,0.5) 2(-0.675,0) 3(-0.675,-0.5) 4(0.675,-0.5) 5(0.675,0.5)
  silkscreen extent -1.12,-0.86 0.51,0.86, body extent -0.8,-0.82 0.8,0.82, height 0.6
"8-VSONP (5x6)" [mm]
  rect 0.82x0.7 smd paste-100 mask+0.051: 1(-2.75,1.907) 2(-2.75,0.637) 3(-2.75,-0.633) 4(-2.75,-1.903)
  rect 0.7x0.7 smd paste-100 mask+0.051: 5(2.75,-1.907) 6(2.75,-0.638) 7(2.75,0.632) 8(2.75,1.902)
  Top Layer region: -1.514,2.28 2.438,2.28 2.438,-2.28 -1.514,-2.28
  silkscreen extent -3.42,-2.54 3.05,2.54, body extent -3,-2.45 3,2.45, height 1.1
16SVPG270M [mm]
  rect 3.5x1.2 smd paste+0 mask+0.051: 1(-2.67,0) 2(2.67,0)
  silkscreen extent -4.04,-3.38 3.38,3.38, body extent -3.9,-3.3 3.9,3.3, height 7.75
50SVPF18M [mm]
  rect 4.2x1.4 smd paste+0 mask+0.051: 1(-3.267,0) 2(3.267,0)
  silkscreen extent -5.1,-4.23 4.2,4.23, body extent -5,-4.15 5,4.15, height 10.05
50SVPF68M [mm]
  rect 4.5x1.65 smd paste+0 mask+0.051: 1(-4.5,0) 2(4.5,0)
  silkscreen extent -5.97,-5.23 5.23,5.23, body extent -5.8,-5.15 5.8,5.15, height 10.21
450MPK474J [mm]
  round 1.8 hole 1.092 paste-2539.97 mask+0: 1(-7.5,0) 2(7.5,0)
  silkscreen extent -9.06,-3.3 9.06,3.3, body extent -9,-3.25 9,3.25, height 11.8
5931 [mil]
  rect 171x318 smd: 1(-219,0) 2(219,0)
  silkscreen extent -122,-165 122,165, body extent -300,-157 300,157, height 15
7447021 [mm]
  round 1.6 hole 0.82: 1(0,4.5) 2(0,-4.5)
  silkscreen extent -8.25,-4.78 8.25,4.8, body extent -8.21,-4.75 8.21,4.75, height 16.41
744822301 [mm]
  round 2.2 hole 1.1: 1(-3.85,-2.5) 2(3.85,-2.5) 3(3.85,2.5) 4(-3.85,2.5)
  silkscreen extent -7.81,-5.43 7.81,5.43, body extent -7.76,-5.4 7.76,5.37, height 19.6
744824310 [mm]
  round 2.5 hole 1.3: 1(-5,-6) 2(5,-6) 3(5,6) 4(-5,6)
  silkscreen extent -12.45,-8.53 12.42,8.59, body extent -12.4,-8.5 12.4,8.53, height 29.58
760895631 [mm]
  rect 2.4x2.4 hole 1.2: 1(-18,17.4)
  round 2.4 hole 1.2: 2(-18,11.6) 3(-18,5.8) 4(-18,0) 5(-18,-5.8) 6(-18,-11.6) 7(-18,-17.4) 8(18,-17.4) 9(18,-11.6) 10(18,-5.8) 11(18,0) 12(18,5.8) 13(18,11.6) 14(18,17.4)
  silkscreen extent -22.68,-20.95 21.55,20.97, body extent -21.55,-20.9 21.55,20.9, height 30.25
37215000001 [mm]
  round 2 hole 1.2 paste-2539.97 mask+0.051: 1(-2.54,0) 2(2.54,0)
  silkscreen extent -4.3,-4.3 4.3,4.3, body extent -4.2,-4.19 4.2,4.19, height 8
B2B-XH-A(LF)(SN)_ [mm]
  rect 2x2 hole 1: 1(-1.25,0)
  round 2 hole 1: 2(1.25,0)
  silkscreen extent -3.78,-3.43 3.74,2.44, body extent -3.72,-3.37 3.68,2.38, height 7
B57235S0100M000 [mil]
  rect 60x60 hole 35.43 paste-99999 mask+1.97: 1(-98.43,0)
  round 60 hole 35.43 paste-99999 mask+1.97: 2(98.43,0)
  silkscreen extent -180,-118 179,118, body extent -177,-118 177,118, height 476
B72210S2271K101 [mm]
  round 2 hole 1.2 paste-2539.97 mask+0.051: 1(-3.749,0.899) 2(3.749,-0.899)
  silkscreen extent -6.27,-2.72 6.25,2.7, body extent -6.25,-2.7 6.25,2.7, height 13.35
Cap-0402 [mil]
  rect 18x25 smd mask+2.36: 1(-18.5,0) 2(18.5,0)
  silkscreen extent -31,-16 31,16, body extent -20,-10 20,10, height 19
Cap-0603 [mil]
  rect 30x35 smd mask+2.36: 1(-30,0) 2(30,0)
  silkscreen extent -49,-21 49,21, body extent -32,-16 31,16, height 34
CAP-0603 [mil]
  rect 30x35 smd mask+2.36: 1(-30,0) 2(30,0)
  silkscreen extent -49,-21 49,21, body extent -32,-16 31,16, height 34
Cap-0805 [mil] "SMD 0805"
  rect 40x60 smd mask+2.76: 1(-40,0) 2(40,0)
  silkscreen extent -64,-34 64,34, body extent -39,-25 39,25, height 30
Cap-1206 [mil] "SMD 1206"
  rect 60x70 smd: 1(-50,0) 2(50,0)
  silkscreen extent -84,-39 84,39, body extent -63,-31 63,32, height 39
DBT50G-7.62-2P-BK-P [mm]
  rect 3.5x3.5 hole 1.7: 1(-3.81,0)
  round 3.5 hole 1.7: 2(3.81,0)
  silkscreen extent -8.22,-10.65 8.38,4.55, body extent -8.25,-10.67 8.25,4.53, height 16.3
DE1B3RA101KN4AN01F [mm]
  rect 1.3x1.3 hole 0.8: 1(-5,0)
  round 1.3 hole 0.8: 2(5,0)
  silkscreen extent -3,-2 3,2, body extent -5.5,-2 5.5,2, height 9
DE1B3RA221KN4AN01F [mm]
  rect 1.3x1.3 hole 0.8: 1(-5,0)
  round 1.3 hole 0.8: 2(5,0)
  silkscreen extent -3,-2 3,2, body extent -5.5,-2 5.5,2, height 9
DE1E3RA222MA4BN01F [mm]
  round 1.6 hole 1.1 paste-2539.97 mask+0.051: 1(-5,0) 2(5,0)
  silkscreen extent -4.5,-2.5 4.5,2.5, body extent -5.34,-2.53 5.34,2.47, height 13
DIP-4 [mm]
  rect 1.8x1.8 hole 1 paste-2539.97 mask+0.051: 1(-3.81,1.265)
  round 1.8 hole 1 copper offset 0,0 paste-2539.97 mask+0.051: 2(-3.81,-1.275) 3(3.81,-1.265) 4(3.81,1.275)
  silkscreen extent -4.98,-2.28 2.53,2.29, body extent -3.91,-2.3 3.91,2.3, height 4.29
DO-214AD [mm]
  rect 1.6x1.7 smd paste+0 mask+0.051: 1(-1.96,0) 2(1.96,0)
  silkscreen extent -2.87,-1.43 1.83,1.42, body extent -2.32,-1.3 2.32,1.3, height 1.06
EEU-FR1V681B [mm]
  rect 1.2x1.2 hole 0.85: 1(-2.5,0)
  round 1.2 hole 0.85: 2(2.5,0)
  silkscreen extent -5,-5 5.03,5, body extent -5,-5 5,5, height 20
EEUFR1V471B [mm]
  round 1.6 hole 1 paste-2539.97 mask+0.05: 1(-2.5,0) 2(2.5,0)
  silkscreen extent -5,-5 5,5, body extent -4.99,-5 5,5, height 24.91
ERF1VM222L25OT [mm]
  round 2.2 hole 1.2 paste-2539.97 mask+0.051: 1(-3.75,0) 2(3.75,0)
  silkscreen extent -8,-8 8,8, body extent -8,-8 8,8, height 24.91
ERM1HM100D11OT [mm]
  rect 1.3x1.3 hole 0.8 paste-2539.97 mask+0.051: 1(-1,0)
  round 1.3 hole 0.8 paste-2539.97 mask+0.051: 2(1,0)
  silkscreen extent -2.5,-2.5 2.5,2.5, body extent -2.5,-2.49 2.5,2.5, height 6.96
ERR1VM102G20OT [mm]
  round 1.6 hole 1 paste-2539.97 mask+0.051: 1(-2.54,0) 2(2.54,0)
  silkscreen extent -5,-5 5.08,5, body extent -4.99,-5 5,5, height 15.91
FAUL1350-1R5MT [mm]
  rect 3.25x5.5 smd: 1(-5.625,0) 2(5.625,0)
  silkscreen extent -6.78,-6.35 6.78,6.35, body extent -6.73,-6.3 6.73,6.3, height 4.8
FC-PFC1060-850M-B-L [mm]
  round 4 hole 2: 1(-5,0) 2(5,0)
  silkscreen extent -27.48,-17.5 7.52,17.5, body extent -27.68,-17.5 7.62,17.5, height 30.7
FXL2213-1R0-M [mm]
  rect 5.75x19.6 smd: 1(-9.125,0) 2(9.125,0)
  silkscreen extent -11.5,-11 11.5,11, body extent -11.5,-11 11.5,11, height 12.6
GBU [mm]
  oval 3x1.4 hole 0.7 slot 2.2 at 0 deg paste-2539.97 mask+0.051: 1(-7.62,0) 2(-2.54,0) 3(2.54,0) 4(7.62,0)
  silkscreen extent -10.8,-2.28 10.79,1.25, body extent -10.75,-2.26 10.75,1.2, height 19.9
HDR1X2_ [mm] "CONN HEADER VERT 2POS 2.54MM"
  rect 1.5x1.5 hole 0.9: 1(0,0)
  round 1.5 hole 0.9: 2(2.54,0)
  silkscreen extent -1.27,-1.27 3.81,1.27, body extent -1.27,-1.27 3.81,1.27, height 8.44
HTSSOP-28-EP [mm]
  rect 1.731x0.343 smd paste+0 mask+0.051: 1(-2.866,4.225) 2(-2.866,3.575) 3(-2.866,2.925) 4(-2.866,2.275) 5(-2.866,1.625) 6(-2.866,0.975) 7(-2.866,0.325) 8(-2.866,-0.325) 9(-2.866,-0.975) 10(-2.866,-1.625) 11(-2.866,-2.275) 12(-2.866,-2.925) 13(-2.866,-3.575) 14(-2.866,-4.225) 15(2.866,-4.225) 16(2.866,-3.575) 17(2.866,-2.925) 18(2.866,-2.275) 19(2.866,-1.625) 20(2.866,-0.975) 21(2.866,-0.325) 22(2.866,0.325) 23(2.866,0.975) 24(2.866,1.625) 25(2.866,2.275) 26(2.866,2.925) 27(2.866,3.575) 28(2.866,4.225)
  rect 3.1x5.6 smd paste+0 mask+0.05: 29(0,0)
  silkscreen extent -3.99,-4.93 1.77,4.93, body extent -3.2,-4.85 3.2,4.85, height 1.2
KN151M45025*30A [mm]
  round 3.8 hole 2.3 paste-2539.97 mask+0.05: 1(-5,0) 2(5,0)
  silkscreen extent -12.58,-12.5 12.42,12.5, body extent -12.51,-12.49 12.5,12.5, height 40.01
KP223J2J0701 [mm]
  rect 1.8x1.8 hole 0.914 paste-2539.97 mask+0.051: 1(-3.75,0)
  round 1.8 hole 0.914 paste-2539.97 mask+0.051: 2(3.75,0)
  silkscreen extent -4.5,-2.25 4.5,2.25, body extent -4.5,-2.2 4.5,2.2, height 11.57
LED-0603 [mm]
  rect 0.5x1 smd: 1(-0.75,0) 2(0.75,0)
  silkscreen extent -1.12,-0.66 1.75,0.66, body extent -0.82,-0.37 0.82,0.36, height 0.68
MPP105J2W10KN22605 [mil]
  round 60 hole 36 paste-99999 mask+1.97: 1(-196.85,0) 2(196.85,0)
  silkscreen extent -239,-142 239,142, body extent -236,-140 236,140, height 673
NB90-12S-S-C [mm]
  round 3.5 hole 2.2 paste-2539.97 mask+0.051: 1(-8.9,1.3) 4(8.9,3.85) 5(8.9,11.55)
  round 2 hole 1.2 paste-2539.97 mask+0.051: 2(-5.1,-11.55) 3(5.1,-11.55)
  silkscreen extent -13.14,-18.13 14.36,14.1, body extent -12.99,-18.07 14.21,13.94, height 20.2
"Net Tie Pad"#1 [mil]
  rect 18x25 smd mask-10: 1(-18.5,0) 2(18.5,0)
  Top Layer region: -15,24.09 15,24.09 15,-31.59 -15,-31.59
"Net Tie Pad"#2 [mil]
  rect 18x25 smd mask-10: 1(-18.5,0) 2(18.5,0)
  Top Layer region: -15.06,87 29.28,87 29.28,-37.53 -15.06,-37.53
PowerPAK-SO-8 [mm]
  rect 1.15x0.7 smd paste+0 mask+0.051: 1(-1.963,1.905) 2(-1.967,0.635) 3(-1.967,-0.635) 4(-1.963,-1.905)
  rect 1x1 smd: 5_6(1.967,0)
  rect 0.595x0.61 smd paste+0 mask+0.051: 7(0.813,2.388) 8(0.813,-2.388)
  Top Layer region: 4.317,-2.4 4.317,2.4 2.667,2.4 2.667,2.15 -0.383,2.15 -0.383,-2.15 2.667,-2.15 2.667,-2.4 4.317,-2.4
  silkscreen extent -2.8,-2.6 2.87,2.6, body extent -2.24,-2.57 3.91,2.57, height 1.24
QFN-16-EP(3.6x3.6) [mm]
  rect 0.82x0.28 smd: 1(-1.75,0.75) 2(-1.75,0.25) 3(-1.75,-0.25) 4(-1.75,-0.75) 9(1.75,-0.75) 10(1.75,-0.25) 11(1.75,0.25) 12(1.75,0.75)
  rect 0.28x0.82 smd: 5(-0.75,-1.75) 6(-0.25,-1.75) 7(0.25,-1.75) 8(0.75,-1.75) 13(0.75,1.75) 14(0.25,1.75) 15(-0.25,1.75) 16(-0.75,1.75)
  round 0.5 hole 0.3: 17(-0.5,-0.5) 17(-0.5,0.5) 17(0.5,-0.5) 17(0.5,0.5)
  rect 2.14x2.14 smd: 17(0,0)
  silkscreen extent -2.4,-1.8 1.78,1.8, body extent -1.75,-1.75 1.75,1.75, height 1
R46KI347050M1K [mm]
  rect 2x2 hole 1 paste-2539.97 mask+0: 1(-7.5,0)
  round 2 hole 1 paste-2539.97 mask+0: 2(7.5,0)
  silkscreen extent -9.06,-5.56 9.04,5.55, body extent -9,-5.5 9,5.5, height 18.59
Res-0201 [mm]
  rect 0.27x0.37 smd mask+0.055: 1(-0.275,0) 2(0.275,0)
  silkscreen extent -0.48,-0.25 0.48,0.25, body extent -0.3,-0.15 0.3,0.15, height 0.29
Res-0402 [mil]
  rect 18x25 smd mask+2.17: 1(-18.5,0) 2(18.5,0)
  silkscreen extent -32,-17 32,16, body extent -23,-11 23,11, height 16
Res-0603 [mil]
  rect 30x35 smd: 1(-30,0) 2(30,0)
  silkscreen extent -48,-21 48,21, body extent -31,-17 31,17, height 18
RES-0603 [mil]
  rect 30x35 smd: 1(-30,0) 2(30,0)
  silkscreen extent -48,-21 48,21, body extent -31,-17 31,17, height 18
res-0603 [mil]
  rect 30x35 smd: 1(-30,0) 2(30,0)
  silkscreen extent -48,-21 48,21, body extent -31,-17 31,17, height 18
RES-0805 [mil] "SMD 0805"
  rect 40x50 smd: 1(-40,0) 2(40,0)
  silkscreen extent -64,-29 64,29, body extent -39,-25 39,24, height 24
Res-1206 [mil]
  rect 60x70 smd: 1(-50,0) 2(50,0)
  silkscreen extent -84,-39 84,39, body extent -63,-31 63,31, height 24
RES-2512 [mm]
  rect 1.6x3.4 smd: 1(-3.25,0) 2(3.25,0)
  silkscreen extent -4.24,-1.85 4.24,1.85, body extent -3.17,-1.63 3.18,1.63, height 0.58
RVT1E330M0505 [mm]
  rect 2.7x0.91 smd paste+0 mask+0.051: 1(-2.4,0) 2(2.4,0)
  silkscreen extent -3.57,-2.62 2.66,2.65, body extent -2.85,-2.65 2.85,2.65, height 5.4
SMA [mm]
  rect 2.5x1.7 smd: 1(-2,0) 2(2,0)
  silkscreen extent -4.44,-1.42 2.06,1.42, body extent -2.6,-1.3 2.6,1.3, height 2.4
SMB_ [mm]
  rect 2.8x2.4 smd: 1(-2.3,0) 2(2.3,0)
  silkscreen extent -2.21,-1.91 4.83,1.9, body extent -2.7,-1.8 2.7,1.8, height 2.3
SOD-123 [mm]
  rect 0.95x0.9 smd: 1(-1.575,0) 2(1.575,0)
  silkscreen extent -1.37,-0.8 2.82,0.8, body extent -1.82,-0.78 1.83,0.78, height 1.5
SOD-123F [mm]
  rect 1.2x1.2 smd: 1(1.6,0) 1(1.6,0) 2(-1.6,0)
  silkscreen extent -1.4,-0.98 2.84,0.98, body extent -1.85,-0.85 1.9,0.85, height 1.2
SOD-323 [mm]
  rect 0.8x0.9 smd mask+0.055: 1(-1.15,0) 2(1.15,0)
  silkscreen extent -2.01,-0.79 0.94,0.79, body extent -1.3,-0.67 1.3,0.67, height 1.1
SOD-523F [mm]
  rect 0.8x0.52 smd: 1(-1,0) 2(1,0)
  silkscreen extent -0.64,-0.51 1.78,0.51, body extent -0.8,-0.4 0.8,0.4, height 0.7
"SOIC-8(0.154\", 3.90mm Width)" [mm]
  rect 1.55x0.6 smd: 1(-2.7,1.905) 2(-2.7,0.635) 3(-2.7,-0.635) 4(-2.7,-1.905) 5(2.7,-1.905) 6(2.7,-0.635) 7(2.7,0.635) 8(2.7,1.905)
  silkscreen extent -3.79,-2.51 1.8,2.51, body extent -3.01,-2.45 3.01,2.45, height 1.63
SOT-23 [mm] "TRANS NPN 40V 0.6A SOT23"
  rect 0.82x0.92 smd: 1(-0.95,-1) 2(0.95,-1) 3(0,1)
  silkscreen extent -1.68,-1.3 1.55,0.81, body extent -1.5,-1.25 1.5,1.25, height 1.05
SOT-23-5 [mm]
  rect 1.1x0.6 smd: 1(-1.3,0.95) 2(-1.3,0) 3(-1.3,-0.95) 4(1.3,-0.95) 5(1.3,0.95)
  silkscreen extent -2.13,-1.5 0.88,1.5, body extent -1.4,-1.45 1.4,1.45, height 1.45
SOT-23-6 [mm]
  rect 1.22x0.62 smd: 1(-1.31,0.95) 2(-1.31,0) 3(-1.31,-0.95) 4(1.31,-0.95) 5(1.31,0) 6(1.31,0.95)
  silkscreen extent -2.18,-1.52 0.86,1.52, body extent -1.5,-1.5 1.5,1.5, height 1.47
SOT-723 [mm]
  rect 0.5x0.45 smd: 1(-0.4,-0.575) 2(0.4,-0.575) 3(0,0.575)
  silkscreen extent -0.94,-0.66 0.64,0.64, body extent -0.6,-0.6 0.6,0.6, height 0.5
T44001 [mm]
  round 2.9 hole 1.9 paste-2539.97 mask+0.051: 1(-2.5,3.6) 1(-2.5,-3.6) 1(2.5,3.6) 1(2.5,-3.6)
  silkscreen extent -4,-4 4,4, body extent -4.1,-4.1 4.1,4.1, height 9.93
"Test Point -TH 1.8mm Hole size 0.92mm" [mm]
  oct 1.8x1.8 hole 0.92: 1(0,0)
  silkscreen extent -1.04,-1.04 1.04,1.07
"Th Hole Test Point (3.7mm Drill 6mm pad)" [mm]
  round 6 hole 3.7: 1(0,0)
  silkscreen extent -3.12,-3.12 3.12,3.12
TO-220-2 [mm]
  rect 2x2.5 hole 1.4 paste-2539.97 mask+0.051: 1(-2.54,0)
  oval 2x2.5 hole 1.4 paste-2539.97 mask+0.051: 2(2.54,0)
  silkscreen extent -5.35,-2.06 5.35,3.14, body extent -5.33,-1.71 5.33,3.1, height 22.95
TO-220-3 [mm]
  rect 2x2 hole 1.2 paste-2539.97 mask+0.051: 1(-2.54,0)
  round 2 hole 1.2 paste-2539.97 mask+0.051: 2(0,0) 3(2.54,0)
  silkscreen extent -5,-2.49 5.03,2.72, body extent -5.05,-1.75 5.05,2.75, height 14.9
TO-263 [mm]
  rect 2.08x3.81 smd: 1(-2.54,-5.335) 3(2.54,-5.335)
  rect 11.43x8.89 smd: 2(0,5.335)
  silkscreen extent -5.21,-5.46 5.11,0.51, body extent -5.08,-6.6 5.02,8.79, height 4.5
TO-277 [mm]
  rect 1.3x1.3 smd: 1(-0.93,-1.975) 3(0.93,-1.975)
  rect 3.4x4.6 smd: 2(0,1.975)
  silkscreen extent -2.16,-2.59 2.16,3.73, body extent -2.1,-2.39 2.1,4.06, height 1.2
UCC256404DDBR [mm]
  rect 1.55x0.6 smd paste+0 mask+0.05: 1(-2.775,4.445) 3(-2.775,1.905) 4(-2.775,0.635) 5(-2.775,-0.635) 6(-2.775,-1.905) 7(-2.775,-3.175) 8(-2.775,-4.445) 9(2.775,-4.445) 10(2.775,-3.175) 11(2.775,-1.905) 12(2.775,-0.635) 14(2.775,1.905) 15(2.775,3.175) 16(2.775,4.445)
  silkscreen extent -3.82,-4.9 1.8,4.9, body extent -3,-4.95 3,4.95, height 1.75
UUD1V150MCL1GS [mm]
  rect 2.5x1.1 smd: 1(-2.15,0) 2(2.15,0)
  silkscreen extent -3.68,-2.72 2.57,2.72, body extent -2.85,-2.6 2.65,2.68, height 6.1
VSON-CLIP-8(6x5) [mm]
  rect 1.27x0.7 smd paste-100 mask+0.051: 1(-3,1.904) 2(-3,0.636) 3(-3,-0.636) 4(-3,-1.906)
  rect 1x0.7 smd paste-100 mask+0.051: 5(3,-1.904) 6(3,-0.634) 7(3,0.636) 8(3,1.906)
  rect 4.5x4.9 smd paste-100 mask+0.051: 8(0.39,0.001)
  silkscreen extent -3.91,-2.57 3,2.55, body extent -3,-2.45 3,2.45, height 1.1
X2P2224KN1B0130150080ES0 [mm]
  round 2 hole 1.2 paste-2539.97 mask+0.05: 1(-5,0) 2(5,0)
  silkscreen extent -6.5,-4 6.5,4, body extent -6.5,-4 6.5,4, height 15
X5050WV-03-N2SN [mm]
  round 3.2 hole 1.9 paste-2539.97 mask+0.051: 1(0,0) 2(5.08,0) 3(10.16,0)
  silkscreen extent -4.32,-4.3 14.48,4.4, body extent -4.18,-4.17 14.34,4.28, height 10.5

## Part data
C1 C9: library part DE1B3RA101KN4AN01F, "CAP CER 100PF 250V RADIAL", LCSC Part Number=C3285641, Manufacturer=Murata, ComponentLink1Description=https://search.murata.co.jp/Ceramy/image/img/A01X/G101/ENG/DE1_RA_N01F_E.pdf?src-supplier=Digikey, ComponentLink1URL=https://search.murata.co.jp/Ceramy/image/img/A01X/G101/ENG/DE1_RA_N01F_E.pdf?src-supplier=Digikey, Height=9mm, Item Type=Capacitors, Manufacturer Part Number=DE1B3RA101KN4AN01F, Material=4241ConductorMaterial, Pricing="1=0.3, 10=0.147, 50=0.147, 100=0.123, 1000=0.089, 10000=0.061 (USD)", RoHS=Yes, Stock=583, Supplier=Mouser
C2 C3 C10 C11: library part DE1B3RA221KN4AN01F, "CAP CER 220PF 250V RADIAL", LCSC Part Number=C1622503, Manufacturer=Murata, ComponentLink1Description=https://search.murata.co.jp/Ceramy/image/img/A01X/G101/ENG/DE1_RA_N01F_E.pdf?src-supplier=Digikey, ComponentLink1URL=https://search.murata.co.jp/Ceramy/image/img/A01X/G101/ENG/DE1_RA_N01F_E.pdf?src-supplier=Digikey, Item Type="Suppression Capacitor", Manufacturer Part Number=DE1B3RA221KN4AN01F, Pricing="1=0.35, 10=0.168, 50=0.168, 100=0.141, 1000=0.107, 10000=0.069 (USD)", RoHS=Yes, Stock=985, Supplier=Mouser
C4: library part X2P2224KN1B0130150080ES0, "220nF ±10% X2 275V Plugin,P=10mm Suppression Capacitors ROHS", LCSC Part Number=C286022, Manufacturer=STE, Package=Plugin,P=10mm, ComponentLink1Description=LCSC, ComponentLink1URL=https://www.lcsc.com/product-detail/Suppression-Capacitors_STE-Songtian-Elec-X2P2224KN1B0130150080ES0_C286022.html, Item Type="Suppression Capacitor", Manufacturer Part Number=X2P2224KN1B0130150080ES0
C5 C6: library part R46KI347050M1K, "CAP FILM 0.47UF 10% 560VDC RAD", LCSC Part Number=C696791, Manufacturer=KEMET, ComponentLink1Description=http://components.arrow.com/part/dataview/47471301S8592209N7429?src-supplier=Arrow+Electronics, ComponentLink1URL=http://components.arrow.com/part/dataview/47471301S8592209N7429?src-supplier=Arrow+Electronics, ComponentLink2Description=http://datasheet.octopart.com/R46KI347050M1K-Kemet-datasheet-5313608.pdf?src-supplier=Mouser, ComponentLink2URL=http://datasheet.octopart.com/R46KI347050M1K-Kemet-datasheet-5313608.pdf?src-supplier=Mouser, ComponentLink3Description=https://datasheet.octopart.com/R46KI347050M1K-Kemet-datasheet-5313608.pdf?src-supplier=Element14, ComponentLink3URL=https://datasheet.octopart.com/R46KI347050M1K-Kemet-datasheet-5313608.pdf?src-supplier=Element14, ComponentLink4Description=http://datasheet.octopart.com/R46KI347050M1K-Kemet-datasheet-5313608.pdf?src-supplier=Newark, ComponentLink4URL=http://datasheet.octopart.com/R46KI347050M1K-Kemet-datasheet-5313608.pdf?src-supplier=Newark, ComponentLink5Description=http://datasheet.octopart.com/R46KI347050M1K-Kemet-datasheet-5313608.pdf?src-supplier=Distrelec, ComponentLink5URL=http://datasheet.octopart.com/R46KI347050M1K-Kemet-datasheet-5313608.pdf?src-supplier=Distrelec, ComponentLink6Description=https://api.kemet.com/component-edge/download/datasheet/R46KI347050M1K.pdf?src-supplier=Digikey, ComponentLink6URL=https://api.kemet.com/component-edge/download/datasheet/R46KI347050M1K.pdf?src-supplier=Digikey, ComponentLink7Description=http://datasheet.octopart.com/R46KI347050M1K-Kemet-datasheet-5313608.pdf?src-supplier=Avnet, ComponentLink7URL=http://datasheet.octopart.com/R46KI347050M1K-Kemet-datasheet-5313608.pdf?src-supplier=Avnet, ComponentLink8Description=http://datasheet.octopart.com/R46KI347050M1K-Kemet-datasheet-5313608.pdf?src-supplier=Farnell, ComponentLink8URL=http://datasheet.octopart.com/R46KI347050M1K-Kemet-datasheet-5313608.pdf?src-supplier=Farnell, ComponentLink9Description=http://datasheet.octopart.com/R46KI347050M1K-Kemet-datasheet-5313608.pdf?src-supplier=Arrow+Electronics, ComponentLink9URL=http://datasheet.octopart.com/R46KI347050M1K-Kemet-datasheet-5313608.pdf?src-supplier=Arrow+Electronics, ComponentLink10Description=http://datasheet.octopart.com/R46KI347050M1K-Kemet-datasheet-5313608.pdf?src-supplier=Onlinecomponents.com, ComponentLink10URL=http://datasheet.octopart.com/R46KI347050M1K-Kemet-datasheet-5313608.pdf?src-supplier=Onlinecomponents.com, ComponentLink11Description=http://datasheet.octopart.com/R46KI347050M1K-Kemet-datasheet-5313608.pdf?src-supplier=Verical, ComponentLink11URL=http://datasheet.octopart.com/R46KI347050M1K-Kemet-datasheet-5313608.pdf?src-supplier=Verical, ComponentLink12Description=http://datasheet.octopart.com/R46KI347050M1K-Kemet-datasheet-5313608.pdf?src-supplier=LCSC, ComponentLink12URL=http://datasheet.octopart.com/R46KI347050M1K-Kemet-datasheet-5313608.pdf?src-supplier=LCSC, ComponentLink13Description=https://datasheet.octopart.com/R46KI347050M1K-Kemet-datasheet-67199277.pdf?src-supplier=TME, ComponentLink13URL=https://datasheet.octopart.com/R46KI347050M1K-Kemet-datasheet-67199277.pdf?src-supplier=TME, ComponentLink14Description=http://datasheet.octopart.com/R46KI347050M1K-Kemet-datasheet-5313608.pdf?src-supplier=Electro+Sonic, ComponentLink14URL=http://datasheet.octopart.com/R46KI347050M1K-Kemet-datasheet-5313608.pdf?src-supplier=Electro+Sonic, Item Type=Capacitor, Lead Length=25mm, Manufacturer Part Number=R46KI347050M1K, Pins=2NUMBER, Pricing="1=0.88, 10=0.633, 50=0.633, 100=0.493, 1000=0.421, 10000=0.322 (USD)", RoHS=Yes, Stock=2256, Supplier=Mouser
C7: library part 450MPK474J, "CAP FILM 0.47UF 5% 450VDC RADIAL", Case/Package=Radial, Dielectric Material=Polypropylene, LCSC Part Number=C2798220, Manufacturer=Rubycon, Max Operating Temperature=105°C, Min Operating Temperature=-40°C, Package Quantity=1, Tolerance=5%, Voltage Rating (DC)=450V, ComponentLink1Description=https://datasheet.ciiva.com/6281/e-mpk-6281321.pdf?src-supplier=Digikey, ComponentLink1URL=https://datasheet.ciiva.com/6281/e-mpk-6281321.pdf?src-supplier=Digikey, ComponentLink2Description=https://datasheet.ciiva.com/15021/e-mpk-15021932.pdf?src-supplier=Digikey, ComponentLink2URL=https://datasheet.ciiva.com/15021/e-mpk-15021932.pdf?src-supplier=Digikey, Height - Seated (Max)=0.433inch, Item Type="Film Capacitors", Lead Pitch=0.591inch, Length=0.709inch, Manufacturer Part Number=450MPK474J, Mounting Technology="Through Hole", Packaging="Cut Tape", Pricing="1=0.84, 10=0.605, 100=0.4311, 4000=0.26942, 8000=0.25962, 12000=0.25531 (USD)", RoHS=Yes, RoHS Compliant=Yes, Series=MPK, Stock=4083, Supplier=Digikey, Termination="PC Pins", Width=0.256inch
C8: library part MPP105J2W10KN22605, "1uF -40℃~+105℃ ±5% 450V Plugin,P=10mm Polypropylene Film Capacitors (CBB) ROHS", LCSC Part Number=C2686214, Manufacturer=KNSCHA, Item Type=Capacitor, Manufacturer Part Number=MPP105J2W10KN22605, RoHS=No, Supplier=LCSC
C12: library part KN151M45025*30A, "20% 900mA@120Hz 10mm 450V 150uF Plugin,D25xL30mm Horn-Type Electrolytic Capacitors ROHS", LCSC Part Number=C513373, Manufacturer=KFSON, Package=Plugin,D25xL30mm, ComponentLink1Description=LCSC, ComponentLink1URL=https://www.lcsc.com/product-detail/Horn-Type-Electrolytic-Capacitors_KFSON-KN151M45025-30A_C513373.html, Item Type=Capacitor, Manufacturer Part Number=KN151M45025*30A
C13: library part CC1206JKNPOCBN100, "CAP CER 10PF 1KV C0G/NPO 1206", LCSC Part Number=C107172, Manufacturer=Yageo, ComponentLink1Description=https://datasheet.ciiva.com/11494/hv-11494856.pdf?src-supplier=Avnet, ComponentLink1URL=https://datasheet.ciiva.com/11494/hv-11494856.pdf?src-supplier=Avnet, Item Type=Capacitor, Manufacturer Part Number=CC1206JKNPOCBN100, Pricing="3000=0.0222, 9000=0.0214, 15000=0.021, 60000=0.0201, 90000=0.0194 (USD)", RoHS=Yes, Stock=9000, Supplier="Future Electronics"
C14: library part CC0603KRX5R9BB104, "CAP CER 0.1UF 50V X5R 0603", Case Code (Imperial)=0603, Case Code (Metric)=1608, Dielectric=X5R, LCSC Part Number=C110022, Manufacturer=Yageo, Max Operating Temperature=85°C, Min Operating Temperature=-55°C, Package Quantity=4000, Supplier Part Number 1=311-4046-1-ND, Tolerance=10%, Voltage Rating=50V, Capacitance=100nF, Case/Package=0603, Category="Ceramic Capacitors", ComponentLink1Description=http://www.mouser.com/ds/2/447/Yageo_UPY-GP_NP0_16V-to-50V_9-358835.pdf?src-supplier=Mouser, ComponentLink1URL=http://www.mouser.com/ds/2/447/Yageo_UPY-GP_NP0_16V-to-50V_9-358835.pdf?src-supplier=Mouser, ComponentLink2Description=https://www.yageo.com/upload/media/product/productsearch/datasheet/mlcc/UPY-GPHC_X5R_4V-to-50V_26.pdf?src-supplier=Digi-Key, ComponentLink2URL=https://www.yageo.com/upload/media/product/productsearch/datasheet/mlcc/UPY-GPHC_X5R_4V-to-50V_26.pdf?src-supplier=Digi-Key, ComponentLink3Description=http://www.yageo.com/exep/pages/download/literatures/ProductSelectionGuide%202014_Final_2.pdf?src-supplier=Digi-Key, ComponentLink3URL=http://www.yageo.com/exep/pages/download/literatures/ProductSelectionGuide%202014_Final_2.pdf?src-supplier=Digi-Key, Halogen Free="Halogen Free", Item Type=Capacitor, Lead Free="Lead Free", Length=0.063inch, Manufacturer Part Number=CC0603KRX5R9BB104, Mount="Surface Mount", Packaging="Tape and Reel", Pricing 1="1=0.10000, 10=0.05200, 50=0.02820, 100=0.02310, 500=0.01648, 1000=0.01294 (USD)", RoHS=Yes, Stock 1=152253, Supplier 1=Digi-Key, Termination=SMD/SMT, Thickness=0.035inch, Voltage Rating (DC)=50V, Weight=7.1E-05oz, Width=0.031inch
C15: library part CC0603KRX7R8BB392, "CAP CER 3900PF 25V X7R 0603", Case Code (Imperial)=0603, Case Code (Metric)=1608, Dielectric=X7R, LCSC Part Number=C519424, Manufacturer=Yageo, Max Operating Temperature=125°C, Min Operating Temperature=-55°C, Tolerance=10%, Voltage Rating=25V, Case/Package=0603, ComponentLink1Description=https://datasheet.ciiva.com/13207/upy-gphc-x7r-6-3v-to-50v-8-12304-13207771.pdf?src-supplier=Mouser, ComponentLink1URL=https://datasheet.ciiva.com/13207/upy-gphc-x7r-6-3v-to-50v-8-12304-13207771.pdf?src-supplier=Mouser, Halogen Free="Halogen Free", Height=900um, Item Type=Capacitor, Lead Free="Lead Free", Length=0.063inch, Manufacturer Part Number=CC0603KRX7R8BB392, Material=4241ConductorMaterial, Mounting Technology="Surface Mount", Packaging="Tape and Reel", Pricing="1=0.1, 10=0.061, 50=0.035, 100=0.0271, 500=0.02036, 1000=0.016 (USD)", RoHS=Yes, Series=CC, Stock=46115, Supplier=Digikey, Termination=SMD/SMT, Thickness=0.035inch, Voltage Rating (DC)=25V, Weight=7.1E-05oz, Width=0.031inch
C16: library part 06035A561JAT2A, "CAP CER 560PF 50V C0G/NP0 0603", LCSC Part Number=C597173, Manufacturer="Kyocera AVX", ComponentLink1Description=https://datasheet.ciiva.com/27051/1032160-27051276.pdf?src-supplier=Jameco, ComponentLink1URL=https://datasheet.ciiva.com/27051/1032160-27051276.pdf?src-supplier=Jameco, ComponentLink2Description=https://datasheet.ciiva.com/16286/ccog-16286446.pdf?src-supplier=Future+Electronics, ComponentLink2URL=https://datasheet.ciiva.com/16286/ccog-16286446.pdf?src-supplier=Future+Electronics, ComponentLink3Description=https://datasheet.ciiva.com/150/ccog-150647.pdf?src-supplier=Digikey, ComponentLink3URL=https://datasheet.ciiva.com/150/ccog-150647.pdf?src-supplier=Digikey, ComponentLink4Description=https://datasheet.ciiva.com/150/ccog-150648.pdf?src-supplier=Digikey, ComponentLink4URL=https://datasheet.ciiva.com/150/ccog-150648.pdf?src-supplier=Digikey, ComponentLink5Description=https://datasheet.ciiva.com/150/ccog-150649.pdf?src-supplier=Digikey, ComponentLink5URL=https://datasheet.ciiva.com/150/ccog-150649.pdf?src-supplier=Digikey, ComponentLink6Description=https://datasheet.ciiva.com/2987/ccog-2987809.pdf?src-supplier=Avnet, ComponentLink6URL=https://datasheet.ciiva.com/2987/ccog-2987809.pdf?src-supplier=Avnet, ComponentLink7Description=https://datasheet.ciiva.com/2987/ccog-2987810.pdf?src-supplier=Avnet, ComponentLink7URL=https://datasheet.ciiva.com/2987/ccog-2987810.pdf?src-supplier=Avnet, ComponentLink8Description=https://datasheet.ciiva.com/5423/ccog-5423589.pdf?src-supplier=Mouser, ComponentLink8URL=https://datasheet.ciiva.com/5423/ccog-5423589.pdf?src-supplier=Mouser, ComponentLink9Description=https://datasheet.ciiva.com/14598/70001039-14598549.pdf?src-supplier=Allied+Electronics, ComponentLink9URL=https://datasheet.ciiva.com/14598/70001039-14598549.pdf?src-supplier=Allied+Electronics, ComponentLink10Description=https://datasheet.ciiva.com/1124/425357-1124836.pdf?src-supplier=Element14, ComponentLink10URL=https://datasheet.ciiva.com/1124/425357-1124836.pdf?src-supplier=Element14, ComponentLink11Description=https://datasheet.ciiva.com/1124/425357-1124837.pdf?src-supplier=Element14, ComponentLink11URL=https://datasheet.ciiva.com/1124/425357-1124837.pdf?src-supplier=Element14, Item Type=Capacitor, Manufacturer Part Number=06035A561JAT2A, Pricing="4000=0.0172, 16000=0.0165, 40000=0.0091, 60000=0.0158, 100000=0.0088, 120000=0.0155, 160000=0.0083, 300000=0.0148 (USD)", RoHS=Yes, Stock=180000, Supplier="Future Electronics"
C17: library part 12063C474KAT2A, "CAP CER 0.47UF 25V X7R 1206", LCSC Part Number=C5128353, Manufacturer="Kyocera AVX", ComponentLink1Description=https://datasheet.ciiva.com/11788/0900766b80dc2409-11788602.pdf?src-supplier=Rs, ComponentLink1URL=https://datasheet.ciiva.com/11788/0900766b80dc2409-11788602.pdf?src-supplier=Rs, ComponentLink2Description=https://datasheet.ciiva.com/19476/2014158-19476160.pdf?src-supplier=Jameco, ComponentLink2URL=https://datasheet.ciiva.com/19476/2014158-19476160.pdf?src-supplier=Jameco, ComponentLink3Description=https://datasheet.ciiva.com/14601/70001075-14601957.pdf?src-supplier=Allied+Electronics, ComponentLink3URL=https://datasheet.ciiva.com/14601/70001075-14601957.pdf?src-supplier=Allied+Electronics, ComponentLink4Description=https://datasheet.ciiva.com/28546/683218-28546839.pdf?src-supplier=Element14, ComponentLink4URL=https://datasheet.ciiva.com/28546/683218-28546839.pdf?src-supplier=Element14, ComponentLink5Description=https://datasheet.ciiva.com/7833/84526-7833365.pdf?src-supplier=Element14, ComponentLink5URL=https://datasheet.ciiva.com/7833/84526-7833365.pdf?src-supplier=Element14, ComponentLink6Description=https://datasheet.ciiva.com/16291/cx7r-16291039.pdf?src-supplier=Future+Electronics, ComponentLink6URL=https://datasheet.ciiva.com/16291/cx7r-16291039.pdf?src-supplier=Future+Electronics, ComponentLink7Description=https://datasheet.ciiva.com/152/cx7r-152592.pdf?src-supplier=Digikey, ComponentLink7URL=https://datasheet.ciiva.com/152/cx7r-152592.pdf?src-supplier=Digikey, ComponentLink8Description=https://datasheet.ciiva.com/152/cx7r-152593.pdf?src-supplier=Digikey, ComponentLink8URL=https://datasheet.ciiva.com/152/cx7r-152593.pdf?src-supplier=Digikey, ComponentLink9Description=https://datasheet.ciiva.com/152/cx7r-152594.pdf?src-supplier=Digikey, ComponentLink9URL=https://datasheet.ciiva.com/152/cx7r-152594.pdf?src-supplier=Digikey, Item Type=Capacitor, Manufacturer Part Number=12063C474KAT2A, Pricing="2000=0.0614, 6000=0.0591, 10000=0.0566, 20000=0.0567, 40000=0.0554, 80000=0.053 (USD)", RoHS=Yes, Stock=38000, Supplier="Future Electronics"